# Altium PCB ESP32-S31-CoreBoard-1.PcbDoc (part 1 of 3)
Units mm, origin at the board's own origin, x right, y up, seen from the top; angles counter-clockwise.
Board outline 65 x 55 mm, 6 copper layers (SIG_0, GND_0, SIG_1, GND_1, PWR, SIG2), stack 1.578 mm thick; 144 components, 138 nets, 624 pads, 309 vias.
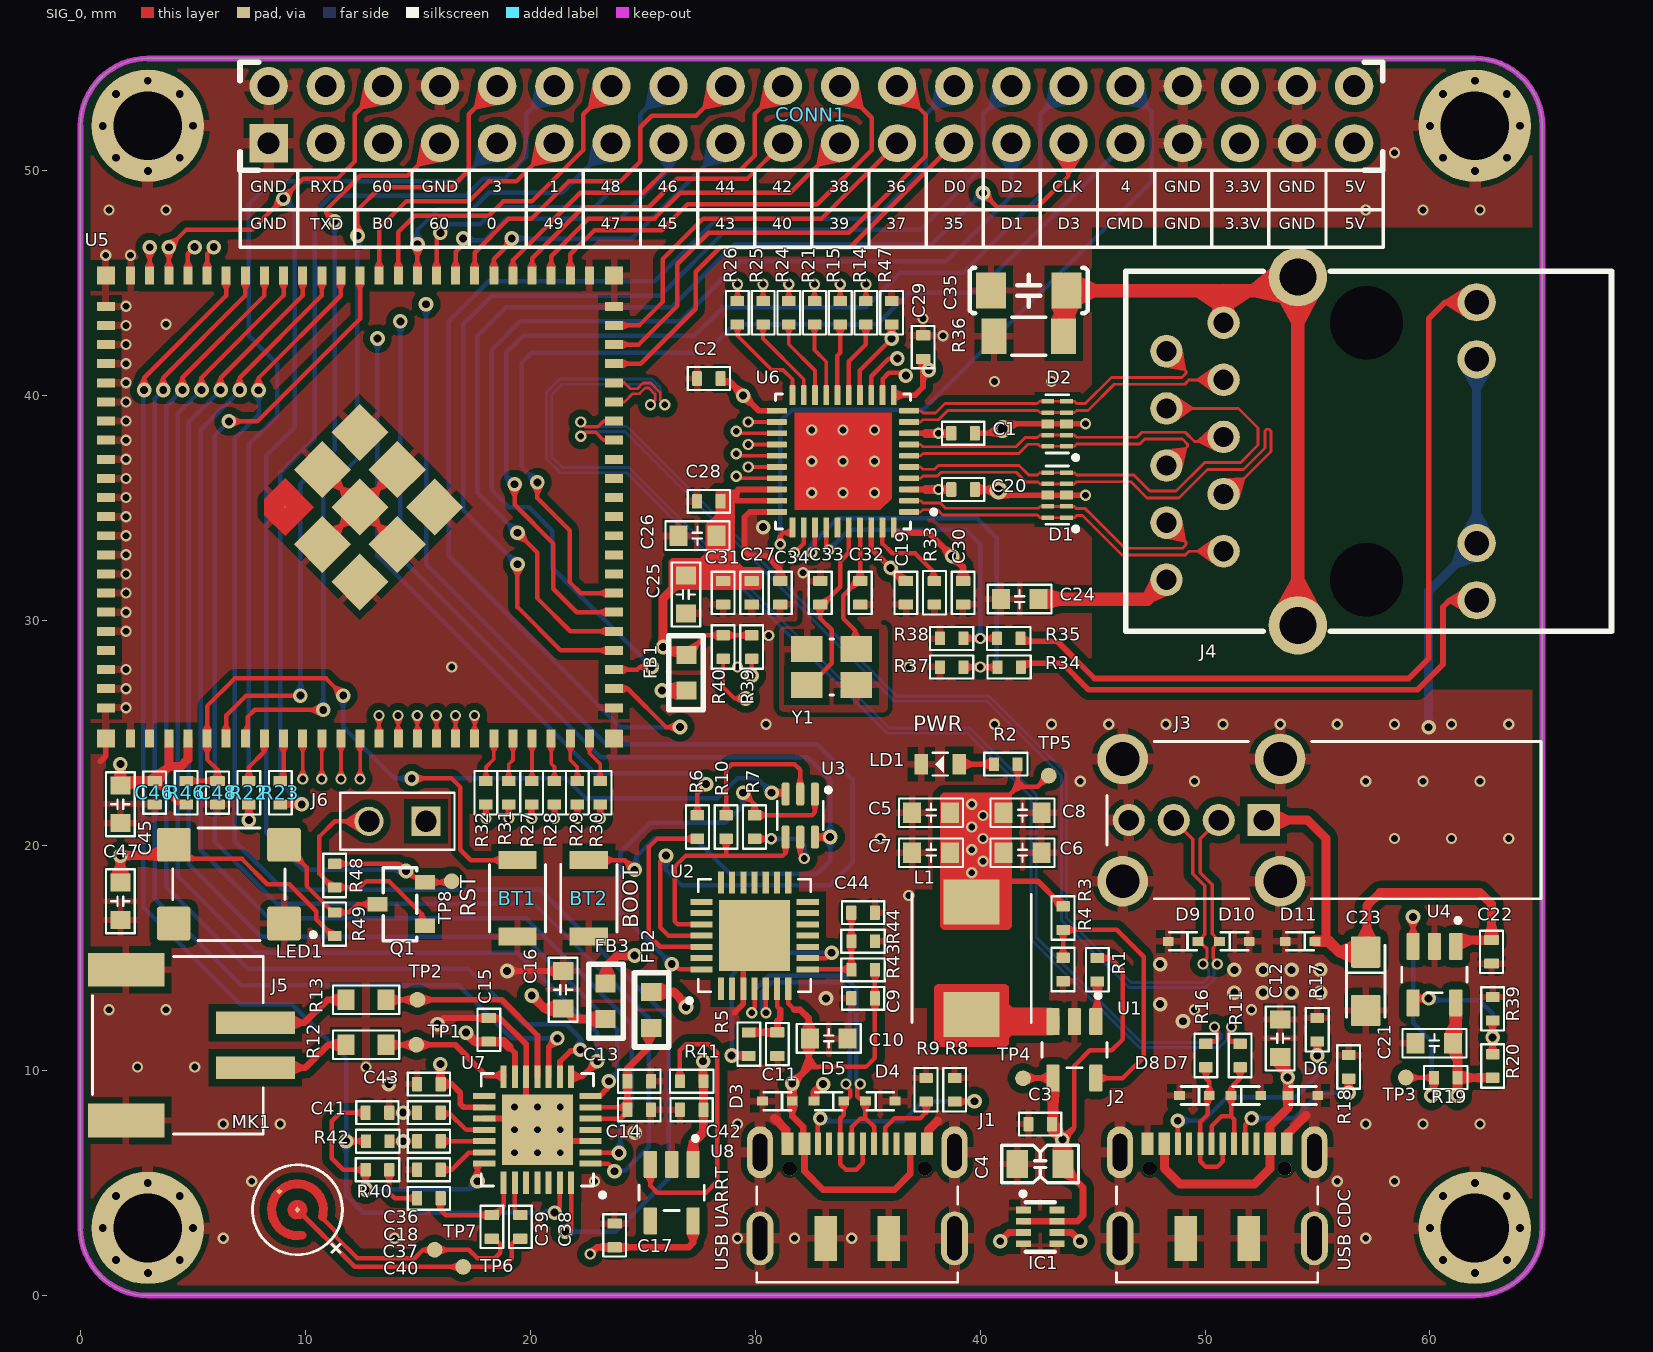
[diagram p0: SIG_0 view]
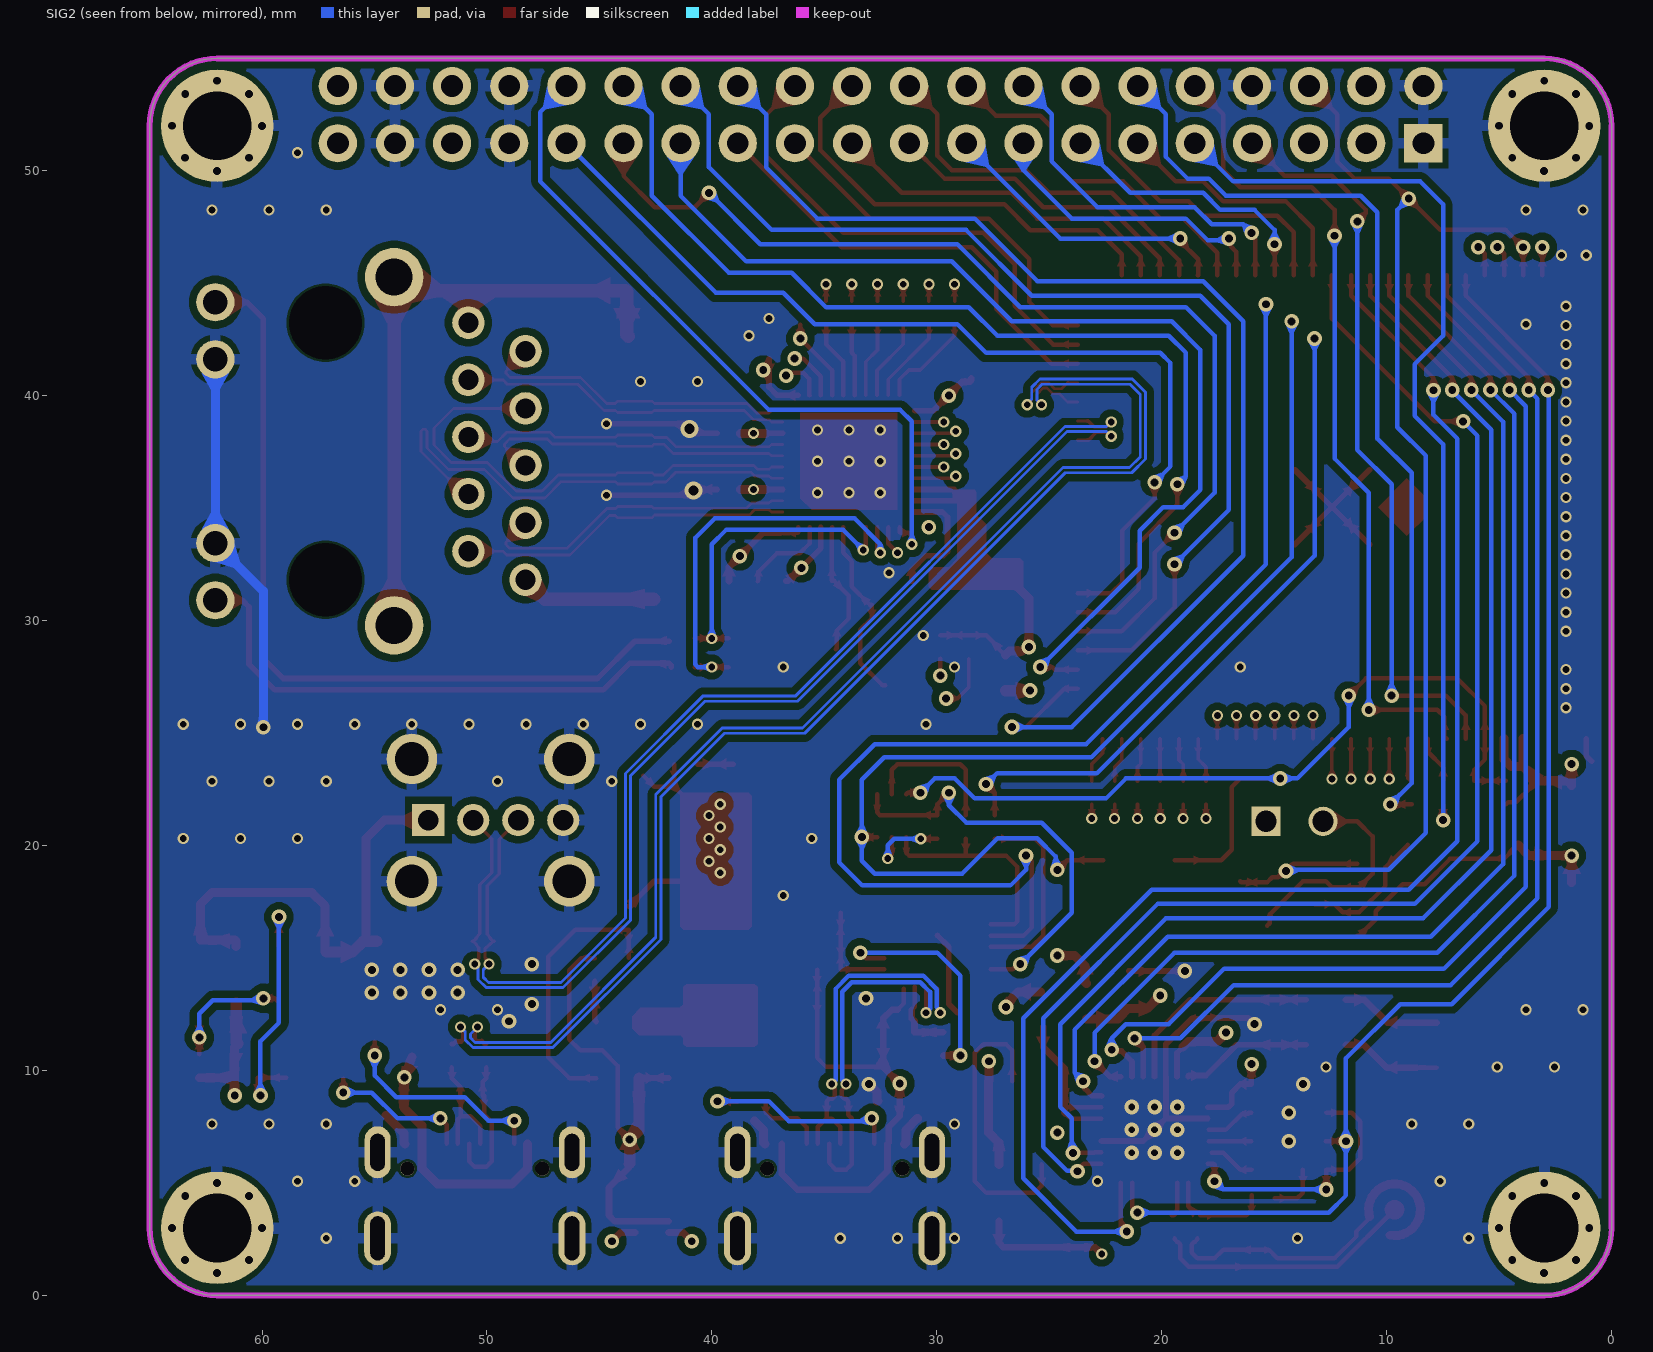
[diagram p1: SIG2 view, seen from below]
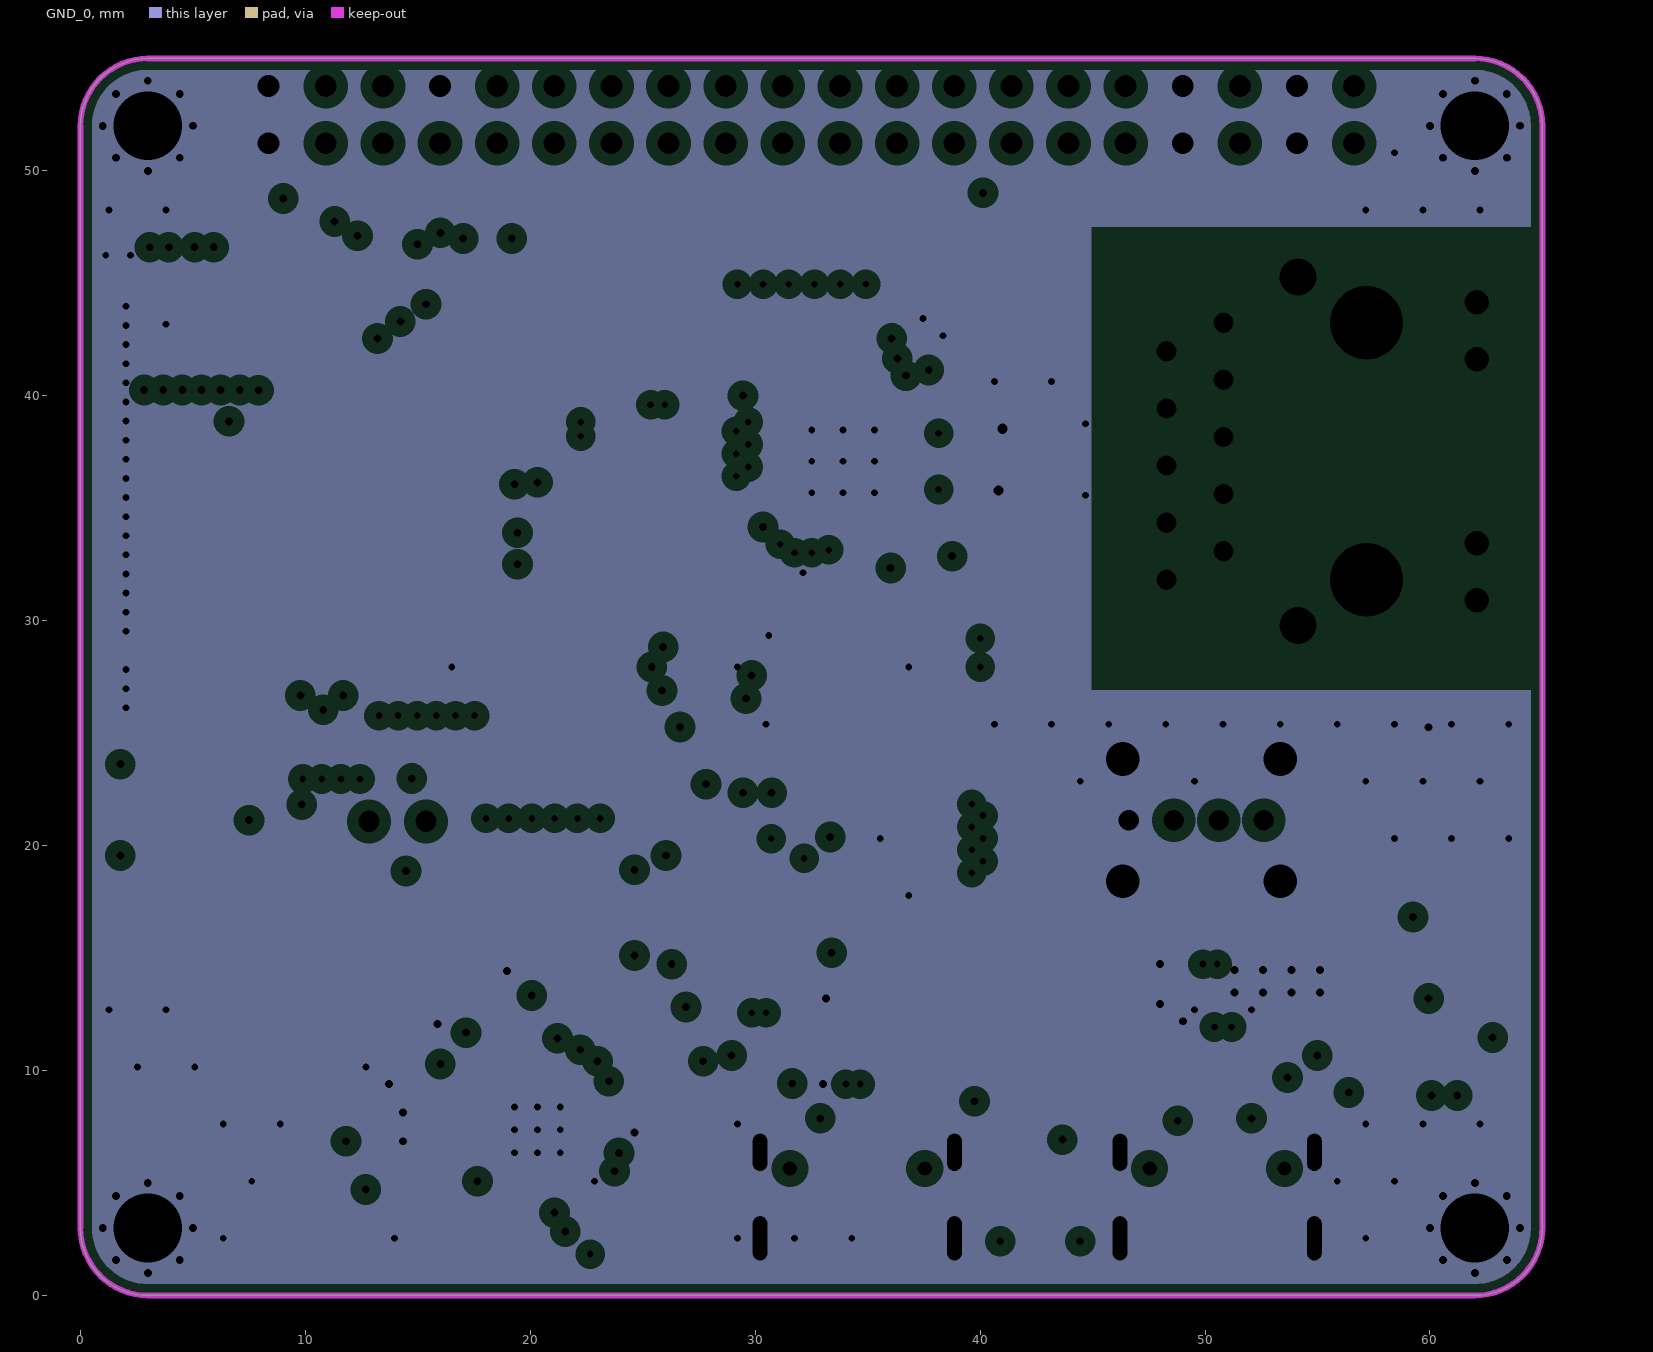
[diagram p2: GND_0, clearances drawn from the general rule]
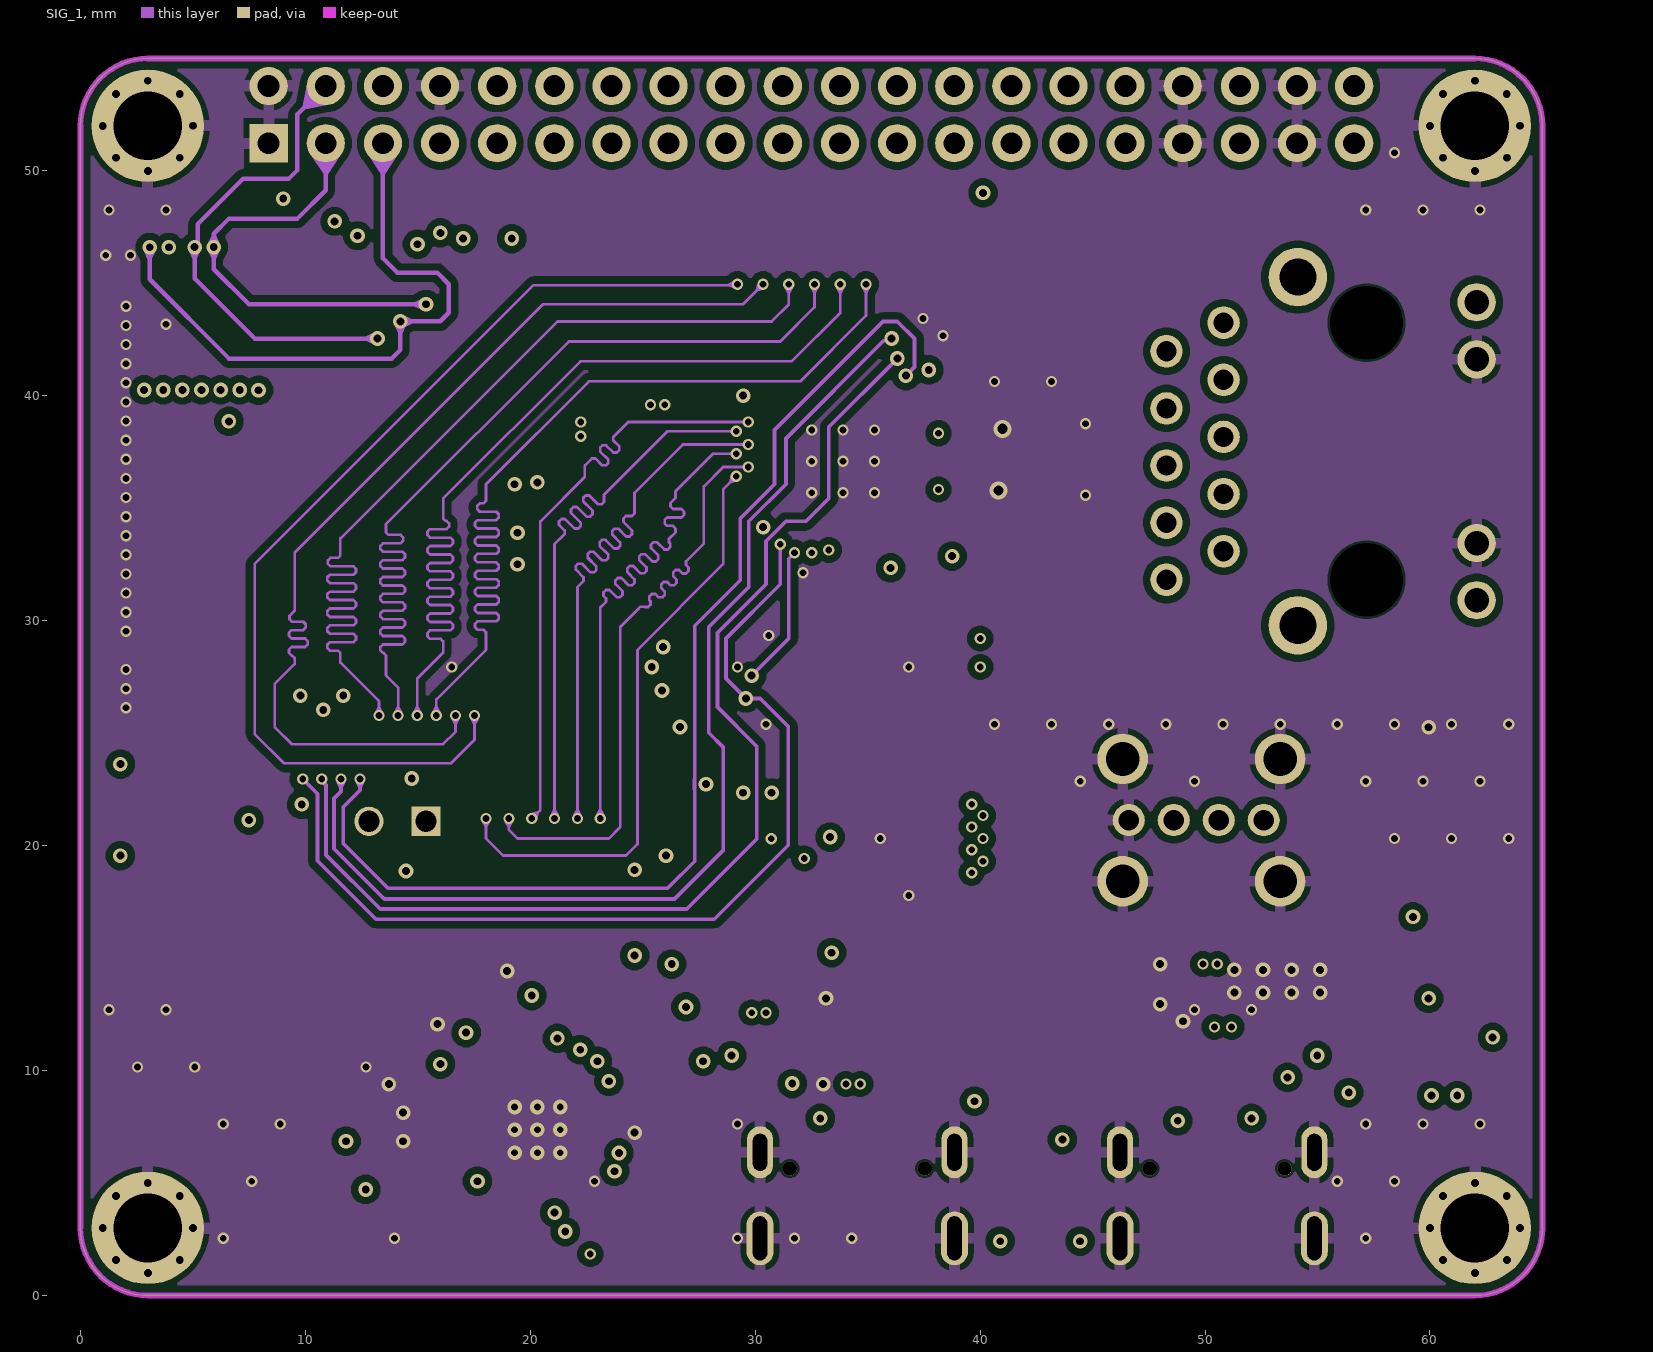
[diagram p3: SIG_1]
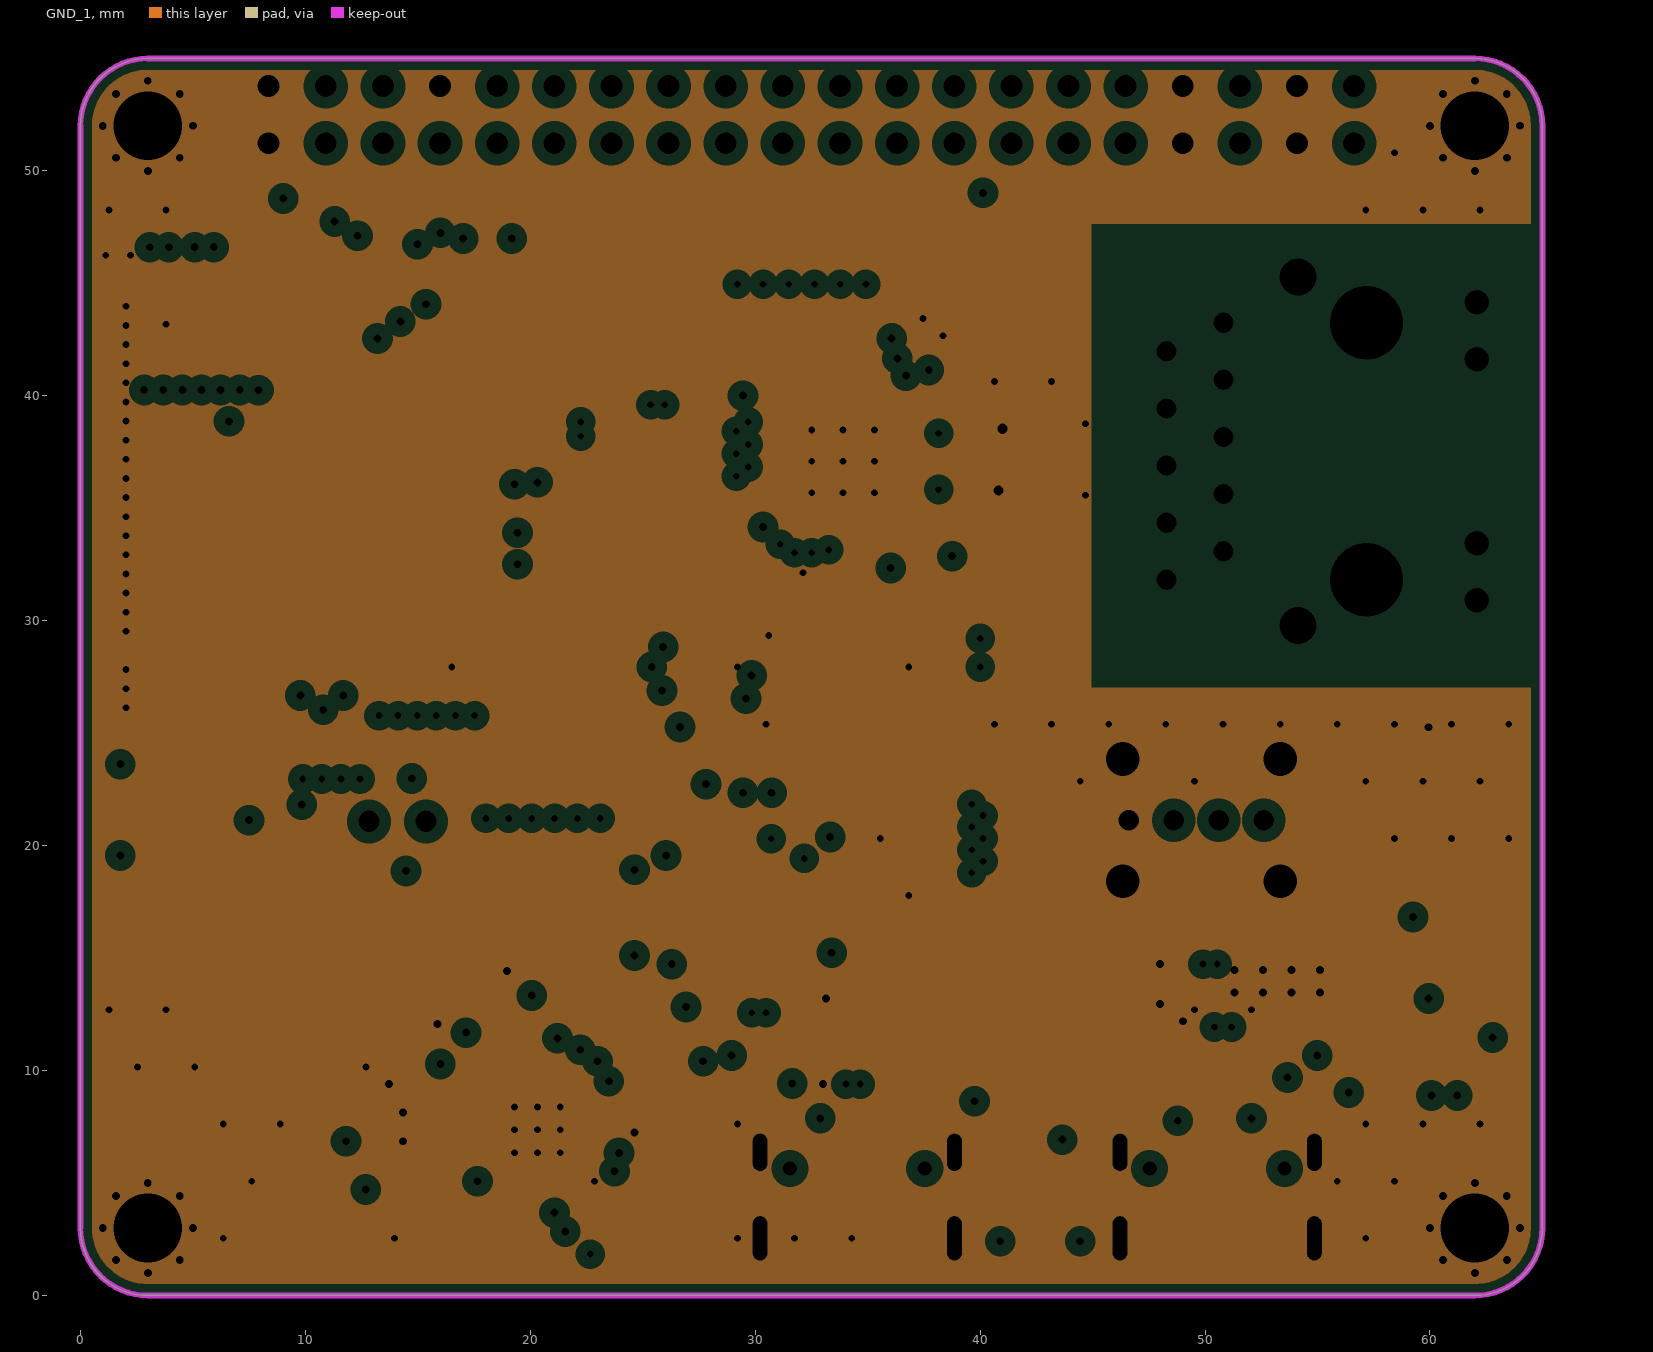
[diagram p4: GND_1, clearances drawn from the general rule]
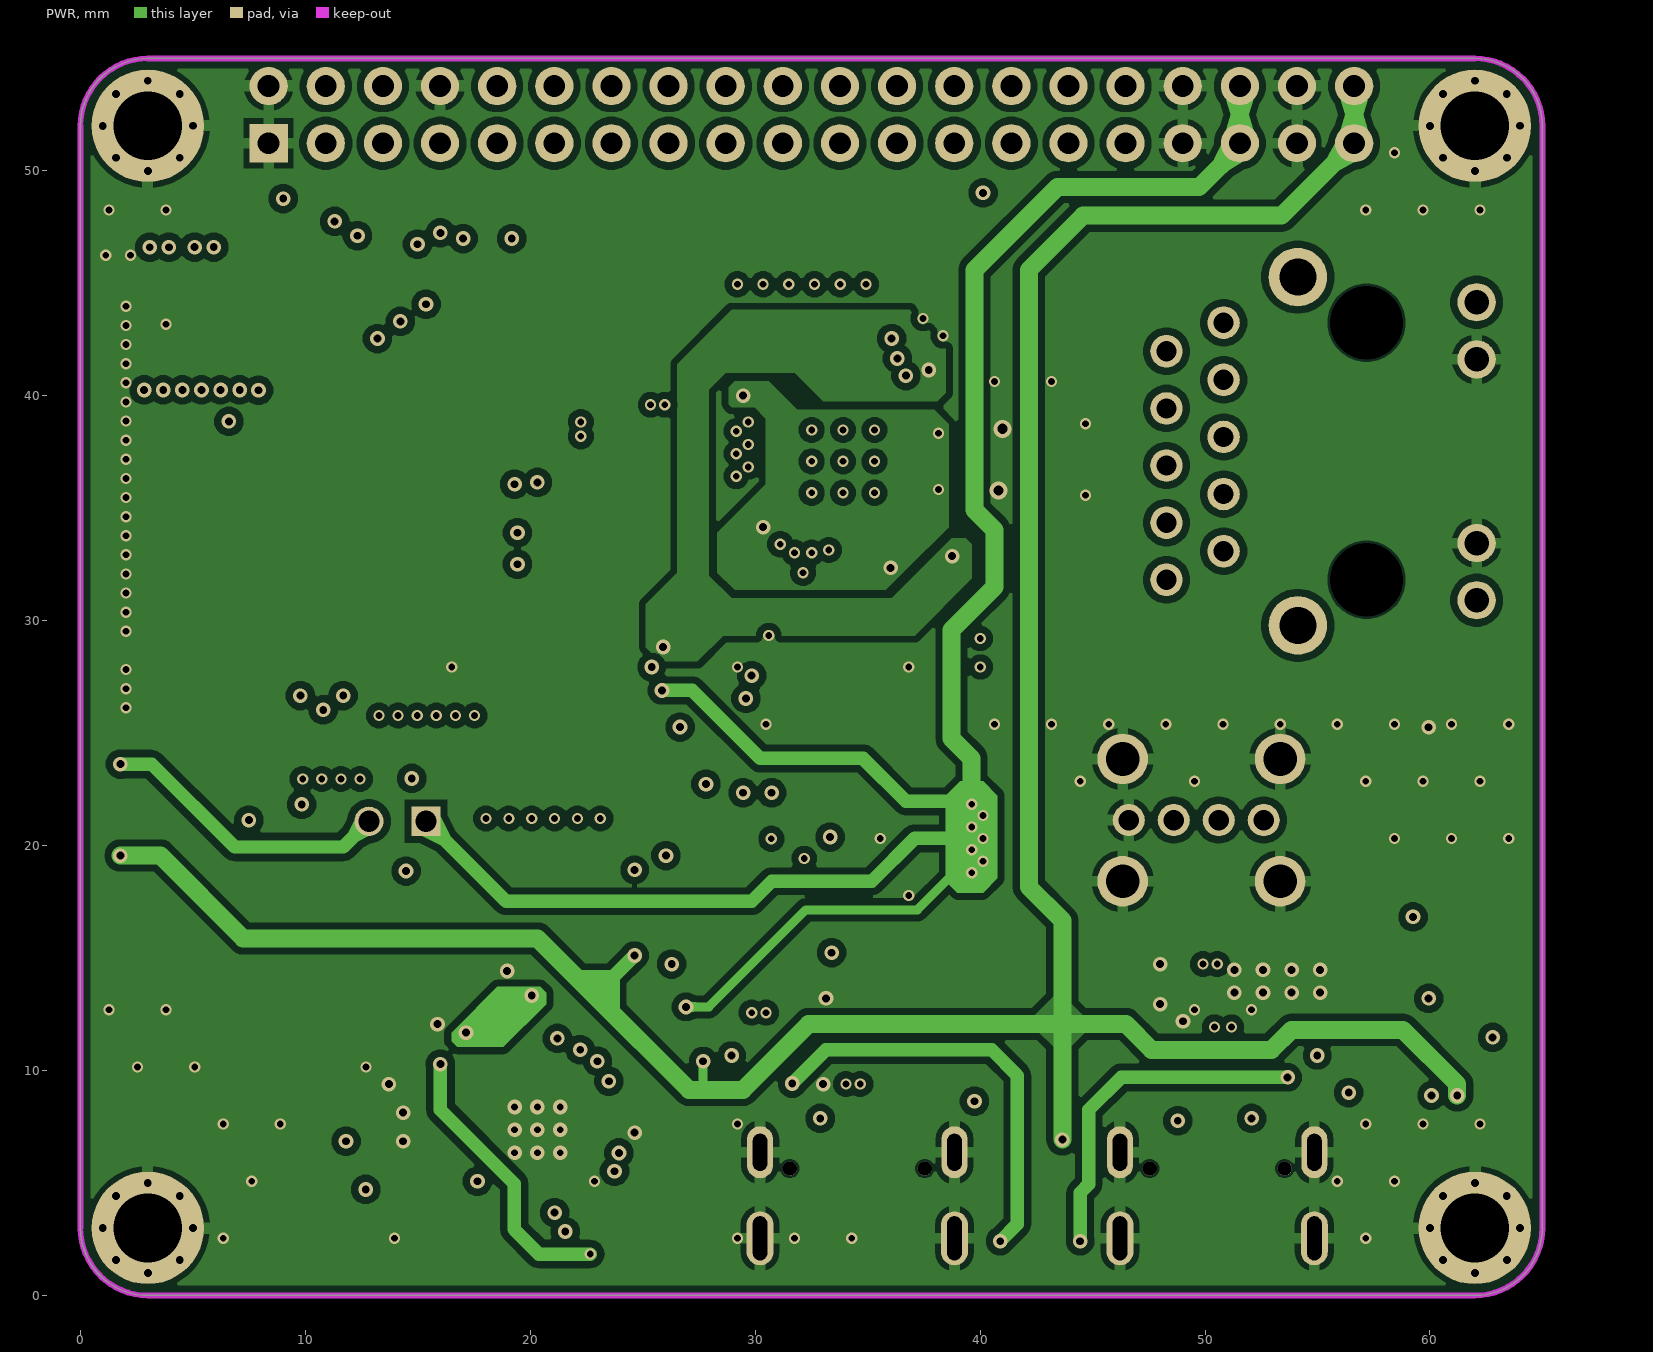
[diagram p5: PWR]

## Layer stack, top to bottom
Top Solder: solder mask 0.0127, Solder Resist, Dk 4.2
SIG_0: signal copper 0.035
Dielectric 2: prepreg 0.0994, PP-006, Dk 4.2
GND_0: plane copper 0.0152, net GND
Dielectric 6: core 0.55, Core, Dk 4.2
SIG_1: signal copper 0.035
Dielectric 1: prepreg 0.1088, PP-014, Dk 4.2
GND_1: plane copper 0.035, net GND
Dielectric 7: core 0.55, Core, Dk 4.2
PWR: signal copper 0.0152
Dielectric 3: prepreg 0.0994, PP-006, Dk 4.2
SIG2: signal copper 0.035
Bottom Solder: solder mask 0.0127, Solder Resist, Dk 4.2

## Board outline
0,3 0,52 cw(c3,52) 3,55 62,55 cw(c62,52) 65,52 65,3 cw(c62,3) 62,0 3,0 cw(c3,3)

## Design rules (kind name [scope] priority, off if disabled: settings)
BoardOutlineClearance pcb [All] p1: gap=0.254 ignorepadtopadclearanceinfootprint=FALSE except(0: Arc-SplitContinuation Track-SplitContinuation SMDPad-SplitContinuation THPad-SplitContinuation Via-SplitContinuation Fill-SplitContinuation Poly-SplitContinuation Region-SplitContinuation Text-SplitContinuation)
Clearance [All] p1: gap=0.32 ignorepadtopadclearanceinfootprint=FALSE except(0: Arc-Text Track-Text SMDPad-Text THPad-Text Via-Text Fill-Text Poly-Text Region-Text Text-Text; 0.102: Arc-Arc Arc-Track Arc-SMDPad Arc-THPad Arc-Via Arc-Hole Track-Track Track-SMDPad Track-THPad Track-Via Track-Hole SMDPad-SMDPad SMDPad-THPad SMDPad-Via SMDPad-Hole THPad-THPad THPad-Via THPad-Hole Via-Via Via-Hole Fill-Hole Poly-Hole Region-Hole Text-Hole)
DiffPairsRouting MDI [InDifferentialPairClass('MDI_class')] p1: maxlimit=0.177 minlimit=0.127 mostfreqgap=0.151 toplayer_mingap=0.177 toplayer_prefgap=0.177 toplayer_minwidth=0.127 toplayer_maxwidth=0.127 toplayer_prefwidth=0.127 impedanceprofiledriven=TRUE impedanceprofileid={8BF83B3B-289C-4500-9CFF-2580BAA26209} impedanceprofilevalue=100.000000 maxuncoupledlength=6
Length MDI_1 [InNetClass('MDI')] p1: maxlimit=0.4 minlimit=0
Length RGMII [InNetClass('RGMII')] p2: maxlimit=0.4 minlimit=0
MaxMinImpedance USB [InNet('No Net')] p1: minimum=10.00 maximum=50.00
PlaneClearance [All] p1: clearance=0.508
PlaneConnect [All] p1: planeconnectstyle=Relief reliefexpansion=0.508 reliefentries=4 reliefconductorwidth=0.254 reliefairgap=0.254
PolygonConnect [All] p1: thpad.connectstyle=Relief thpad.reliefconductorwidth=0.5 thpad.reliefentries=4 thpad.polygonreliefangle="90 Angle" thpad.airgapwidth=0.254 smdpad.connectstyle=Relief smdpad.reliefconductorwidth=0.3 smdpad.reliefentries=4 smdpad.polygonreliefangle="90 Angle" smdpad.airgapwidth=0.3 via.connectstyle=Direct via.reliefconductorwidth=0.254 via.reliefentries=4 via.polygonreliefangle="90 Angle" via.airgapwidth=0.254
RoutingVias [All] p1: holewidth=0.711 width=1.27 viastyle="Through Hole" minholewidth=0.3 minwidth=0.4 maxholewidth=0.711 maxwidth=1.27
SolderMaskExpansion [All] p1: expansion=0.102 istentingtop=FALSE
SupplyNets "Schematic Supply Nets_12" [InNet('ADC_DAC_3V3')] p1: voltage=0.000
SupplyNets "Schematic Supply Nets_2" [InNet('ESP_3V3')] p2: voltage=0.000
SupplyNets "Schematic Supply Nets_11" [InNet('VCC_5V')] p3: voltage=0.000
SupplyNets "Schematic Supply Nets_6" [InNet('VCC_3V3')] p4: voltage=0.000
SupplyNets "Schematic Supply Nets_10" [InNet('PHY_VDDL')] p5: voltage=0.000
SupplyNets "Schematic Supply Nets_9" [InNet('ETH_3V3')] p6: voltage=0.000
SupplyNets "Schematic Supply Nets_8" [InNet('TCT')] p7: voltage=0.000
SupplyNets "Schematic Supply Nets" [InNet('VBUS_HOST')] p8: voltage=0.000
SupplyNets "Schematic Supply Nets_7" [InNet('CHASSIS')] p9: voltage=0.000
SupplyNets "Schematic Supply Nets_5" [InNet('VDD')] p10: voltage=0.000
SupplyNets "Schematic Supply Nets_4" [InNet('VBUS_CDC')] p11: voltage=0.000
SupplyNets "Schematic Supply Nets_3" [InNet('VBUS_UART')] p12: voltage=0.000
SupplyNets "Schematic Supply Nets_1" [InNet('GND')] p13: voltage=0.000
Width RGMII_1 [InNetClass('RGMII')] p1: maxlimit=0.365 minlimit=0.121 preferedwidth=0.165 toplayer_minwidth=0.165 toplayer_maxwidth=0.165 midlayer1_maxwidth=0.121 midlayer1_prefwidth=0.121 impedanceprofiledriven=TRUE impedanceprofileid={7F7283E7-2FD4-493B-95BE-EF3EC65E77F1} impedanceprofilevalue=50.000000 minimp=50.000000 maximp=50.000000 favimp=50.000000
Width [All] p2: maxlimit=3 minlimit=0.12 preferedwidth=0.254
27 further rules are at their usual default settings.

## Classes and differential pairs
differential pair class MDI_class: MDI0 MDI1 MDI2 MDI3
net class RGMII: GPIO8 GPIO9 GPIO10 GPIO11 GPIO12 GPIO13 PHY_AD0 PHY_AD1 PHY_AD2 PLL_OFF RXD_LY TXD_LY
net class MDI: MDI0_N MDI0_P MDI1_N MDI1_P MDI2_N MDI2_P MDI3_N MDI3_P
component class USB: C3 C4 C5 C6 C7 C8 C9 C10 C11 C12 C21 C22 C23 C44 D3 D4 D5 D6 D7 D8 D9 D10 D11 IC1 J1 J2 J3 L1 LD1 R1 R2 R3 R4 R5 R6 R7 R8 R9 R10 R11 R16 R17 R18 R19 R20 R39 R43 R44 TP3 TP4 TP5 U1 U2 U3 U4
component class Ethernet: C1 C2 C19 C20 C24 C25 C26 C27 C28 C29 C30 C31 C32 C33 C34 C35 D1 D2 FB1 J4 R14 R15 R21 R24 R25 R26 R27 R28 R29 R30 R31 R32 R33 R34 R35 R36 R37 R38 R39 R40 R47 U6 Y1
component class ESP32-S31: BT1 BT2 C45 C46 C47 C48 CONN1 J6 LED1 Q1 R22 R23 R46 R48 R49 TP8 U5
component class Audio: C13 C14 C15 C16 C17 C18 C36 C37 C38 C39 C40 C41 C42 C43 FB2 FB3 J5 MK1 R12 R13 R40 R41 R42 TP1 TP2 TP6 TP7 U7 U8
differential pair USB_HOST: +USB_HOST_P -USB_HOST_N
differential pair USB1: +USB1_P -USB1_N
differential pair USB0: +USB0_P -USB0_N
differential pair MDI3: +MDI3_P -MDI3_N
differential pair MDI2: +MDI2_P -MDI2_N
differential pair MDI1: +MDI1_P -MDI1_N
differential pair MDI0: +MDI0_P -MDI0_N

## Components (designator, comment, footprint, x,y, rotation, side; value= is the part's Value field where it differs from the comment)
BT1 "Button-2" SW_B3U-1000PM 19.431,17.653 r90 top
BT2 "Button-2" SW_B3U-1000PM 22.606,17.653 r90 top
C1 "0.1uF 10V 10%" C0402 39.243,38.334 r180 top
C2 "0.1uF 10V 10%" C0402 27.94,40.767 r0 top
C3 "0.1uF 16V 10%" C0402 42.672,7.62 r0 top
C4 "10uF 10V 20%" C0805 42.672,5.842 r0 top
C5 "2.2uF 16V 10%" C0603 37.821,21.463 r180 top
C6 "2.2uF 16V 10%" C0603 41.885,19.685 r0 top
C7 "2.2uF 16V 10%" C0603 37.821,19.685 r180 top
C8 "2.2uF 16V 10%" C0603 41.885,21.463 r0 top
C9 "0.1uF 16V 10%" C0402 34.798,13.208 r0 top
C10 "4.7uF 16V 10%" C0603 33.274,11.43 r180 top
C11 "2.2uF 10V 10%" C0402 30.988,11.176 r90 top
C12 "0.1uF 16V 10%" C0603 53.34,11.43 r270 top
C13 "1uF 10V 10%" C0402 24.846,9.525 r0 top
C14 "1uF 10V 10%" C0402 24.846,8.255 r0 top
C15 "100pF 16V 10%" C0402 18.161,11.811 r90 top
C16 "10uF 16V 10%" C0603 21.463,13.589 r90 top
C17 "1uF 16V 10%" C0402 23.749,2.667 r90 top
C18 "1uF 10V 10%" C0402 15.494,6.858 r180 top
C19 "0.1uF 10V 10%" C0402 36.703,31.242 r90 top
C20 "0.1uF 10V 10%" C0402 39.243,35.834 r180 top
C21 "10uF 10V 20%" C0603 60.198,11.214 r0 top
C22 "0.1uF/16V 10%" C0402 62.738,15.278 r90 top
C23 "22uF 10V 20%" C1206P 57.15,13.97 r270 top
C24 "1uF 16V 10%" C0603 41.758,30.963 r180 top
C25 "4.7uF 6.3V 10%" C0603 26.924,31.166 r90 top
C26 "4.7uF 6.3V 10%" C0603 27.432,33.782 r0 top
C27 "0.1uF 10V 10%" C0402 29.845,31.242 r90 top
C28 "0.1uF 10V 10%" C0402 27.94,35.306 r0 top
C29 "0.1uF 10V 10%" C0402 37.465,42.164 r270 top
C30 "0.1uF 10V 10%" C0402 39.243,31.242 r90 top
C31 "0.1uF 10V 10%" C0402 28.575,31.242 r90 top
C32 "8.2pF/50V 10%" C0402 34.671,31.242 r90 top
C33 "8.2pF/50V 10%" C0402 32.893,31.242 r270 top
C34 "0.1uF 10V 10%" C0402 31.115,31.242 r90 top
C35 "1000pF/2KV" C1206 42.164,44.679 r0 top
C36 "1uF 10V 10%" C0402 15.494,8.128 r180 top
C37 "1uF 10V 10%" C0402 15.494,5.588 r180 top
C38 "1uF 16V 10%" C0402 19.562,3.048 r90 top
C39 "1uF 16V 10%" C0402 18.292,3.048 r90 top
C40 "1uF 16V 10%" C0402 15.494,4.318 r180 top
C41 "1uF 16V 10%" C0402 13.208,8.128 r0 top
C42 "1uF 16V 10%" C0402 27.178,8.255 r180 top
C43 "1uF 16V 10%" C0402 15.494,9.398 r180 top
C44 "2.2uF 10V 10%" C0402 34.798,17.018 r180 top
C45 "4.7uF 6.3V 10%" C0603 1.778,21.844 r90 top
C46 "0.1uF 10V 10%" C0402 3.302,22.352 r90 top
C47 "1uF 16V 10%" C0603 1.778,17.526 r90 top
C48 "1uF 16V 10%" C0402 6.096,22.352 r270 top
CONN1 "CONNECTOR-2X20" "2.54 2X20" 7.1,51.228 r0 top
D1 "TPD4E02B04DQAR" USON-10 43.426,35.579 r180 top
D2 "TPD4E02B04DQAR" USON-10 43.426,38.754 r180 top
D3 "LESD5D5.0CT1G" SOD-523 30.988,8.636 r180 top
D4 "LESD5D5.0CT1G" SOD-523 35.56,8.636 r0 top
D5 "LESD5D5.0CT1G" SOD-523 33.274,8.636 r180 top
D6 "LESD5D5.0CT1G" SOD-523 54.356,8.89 r0 top
D7 "LESD5D5.0CT1G" SOD-523 51.816,8.89 r0 top
D8 "LESD5D5.0CT1G" SOD-523 49.53,8.89 r180 top
D9 "LESD5D5.0CT1G" SOD-523 49.022,15.748 r180 top
D10 "LESD5D5.0CT1G" SOD-523 51.308,15.748 r0 top
D11 "LESD5D5.0CT1G" SOD-523 54.229,15.748 r180 top
FB1 "33R 100MHz" L0603 26.924,27.686 r90 top
FB2 "120R 100MHz" L0603 25.4,12.7 r270 top
FB3 "330R 100MHz" L0603 23.368,13.081 r270 top
IC1 "LM66200DRLR" SOT8 42.672,3.048 r270 top
J1 "USB-C" JAE_DX07S016JA1R1500 34.54,5.64 r0 top
J2 "USB-C" JAE_DX07S016JA1R1500 50.54,5.64 r0 top
J3 "USB-A1SSW6" USB-A-VERTICAL 52.61,21.135 r90 top
J4 "HR911130C" HR911130C 57.277,37.084 r270 top
J5 "SPK 4R-8R" JST_S2B-PH-SM4-TB(LF)(SN) 7.782,11.128 r270 top
J6 "Jump_2.54mm" "2.54 2X1" 15.367,21.082 r180 top
L1 "2.2uH 20%" IND_ASPI-0530HI-2R2M-T2 39.624,14.986 r90 top
LD1 "LED-SMD" LED0603 38.227,23.622 r180 top
LED1 "ARGB" WS2812-5050 6.604,18.288 r0 top
MK1 "MIC-0413" MIC_CMEJ-0413-42-SMT-TR 9.652,3.81 r135 top
Q1 "Mosfet N Signal" SOT-23 14.224,17.399 r90 top
R1 "10K 1%" R0402 45.212,14.478 r90 top
R2 "6.8K 1%" R0402 41.148,23.622 r180 top
R3 "100K 1%" R0402 43.688,16.779 r90 top
R4 "22.1K 1%" R0402 43.688,14.493 r90 top
R5 "1K 1%" R0402 29.718,11.176 r270 top
R6 "499R 1%" R0402 27.436,20.828 r270 top
R7 "10K 1%" R0402 29.972,20.828 r270 top
R8 "5.1K 1%" R0402 38.866,9.144 r90 top
R9 "5.1K 1%" R0402 37.596,9.144 r90 top
R10 "10K 1%" R0402 28.706,20.828 r90 top
R11 "33R" R0402 51.562,10.668 r90 top
R12 "0R 1%" R0603 12.7,11.144 r180 top
R13 "0R 1%" R0603 12.7,13.144 r180 top
R14 "33R 1%" R0402 34.925,43.688 r270 top
R15 "33R 1%" R0402 33.782,43.688 r270 top
R16 "33R" R0402 50.038,10.668 r90 top
R17 "5.1K 1%" R0402 54.991,11.811 r90 top
R18 "5.1K 1%" R0402 56.388,10.16 r90 top
R19 "10K 1%" R0402 60.706,9.69 r0 top
R20 "10K 1%" R0402 62.789,10.203 r270 top
R21 "33R 1%" R0402 32.639,43.688 r270 top
R22 "0R" R0402 7.493,22.352 r90 top
R23 "0R" R0402 8.89,22.352 r90 top
R24 "33R 1%" R0402 31.496,43.688 r270 top
R25 "33R 1%" R0402 30.353,43.688 r270 top
R26 "33R 1%" R0402 29.21,43.688 r270 top
R27 "33R 1%" R0402 20.062,22.352 r270 top
R28 "33R 1%" R0402 21.078,22.352 r270 top
R29 "33R 1%" R0402 22.094,22.352 r270 top
R30 "33R 1%" R0402 23.11,22.352 r270 top
R31 "33R 1%" R0402 19.046,22.352 r270 top
R32 "33R 1%" R0402 18.03,22.352 r270 top
R33 "2.49K 1%" R0402 37.973,31.242 r90 top
R34 "330R 1%" R0402 41.29,27.94 r0 top
R35 "330R 1%" R0402 41.275,29.21 r0 top
R36 "1M 5%" R1206 42.164,42.647 r180 top
R37 "4.7K 1%" R0402 38.735,27.94 r180 top
R38 "4.7K 1%" R0402 38.735,29.21 r180 top
R39 "4.7K 1%" R0402 29.845,28.829 r270 top
R39 "10K 1%" R0402 62.789,12.743 r270 top
R40 "4.7K 1%" R0402 28.575,28.829 r270 top
R40 "2.2K 1%" R0402 13.208,5.588 r0 top
R41 "10K 1%" R0402 27.178,9.525 r0 top
R42 "10K 1%" R0402 13.223,6.858 r180 top
R43 "22.1K 1%" R0402 34.798,14.478 r0 top
R44 "47.5K 1%" R0402 34.798,15.748 r0 top
R46 "10K 1%" R0402 4.699,22.352 r90 top
R47 "4.7K 1%" R0402 36.068,43.688 r270 top
R48 "10K 1%" R0402 11.303,18.669 r90 top
R49 "10K 1%" R0402 11.303,16.51 r90 top
TP1 "Test point" TP 14.939,11.144 r180 top
TP2 "Test point" TP 14.986,13.144 r180 top
TP3 "Test point" TP 58.928,9.69 r180 top
TP4 "Test point" TP 41.91,9.652 r90 top
TP5 "Test point" TP 43.053,23.114 r90 top
TP6 "Test point" TP 17.018,1.27 r90 top
TP7 "Test point" TP 15.748,2.032 r90 top
TP8 "Test point" TP 16.51,18.415 r135 top
U1 "TLV62569PDDCR" SOT23-5 44.196,10.922 r270 top
U2 "CP2102N-A02-GQFN28" QFN-28 29.972,16.002 r90 top
U3 "BC847" SOT-363 32.004,21.336 r270 top
U4 "TPS2051CDBVR" SOT23-5 60.198,14.262 r270 top
U5 "ESP32-S31-WROOM-3" ESP32-S31-WROOM-3 24.433,24.052 r90 top
U6 "YT8531" QFN-40 33.909,37.084 r180 top
U7 "ES8374" QFN-28 20.32,7.366 r180 top
U8 "ME6211C33M5G" SOT23-5 26.289,4.572 r270 top
Y1 "X322525MRB4SI" "XTAL 4P 3225" 33.401,27.94 r90 top

## Footprints (in the part's own frame and the unit in brackets; to place one, negate y for a bottom-side part, rotate by r counter-clockwise, add the part's x,y. Pads: shape width x height; smd on the part's side, far side on the other; paste and mask are expansions set on the pad)
"2.54 2X1" [mm]
  rect 1.3x1.3 hole 0.94: 1(0,0)
  round 1.3 hole 0.94: 2(2.54,0)
  silkscreen extent -1.27,-1.27 3.81,1.27, body extent -1.33,-1.23 3.87,1.27, height 8.5
"2.54 2X20" [mm]
  rect 1.7x1.7 hole 0.97: 1(1.27,0)
  round 1.7 hole 0.97: 2(1.27,2.54) 3(3.81,0) 4(3.81,2.54) 5(6.35,0) 6(6.35,2.54) 7(8.89,0) 8(8.89,2.54) 9(11.43,0) 10(11.43,2.54) 11(13.97,0) 12(13.97,2.54) 13(16.51,0) 14(16.51,2.54) 15(19.05,0) 16(19.05,2.54) 17(21.59,0) 18(21.59,2.54) 19(24.13,0) 20(24.13,2.54) 21(26.67,0) 22(26.67,2.54) 23(29.21,0) 24(29.21,2.54) 25(31.75,0) 26(31.75,2.54) 27(34.29,0) 28(34.29,2.54) 29(36.83,0) 30(36.83,2.54) 31(39.37,0) 32(39.37,2.54) 33(41.91,0) 34(41.91,2.54) 35(44.45,0) 36(44.45,2.54) 37(46.99,0) 38(46.99,2.54) 39(49.53,0) 40(49.53,2.54)
  silkscreen extent 0,-1.2 50.8,3.6, body extent 0,-1.2 50.8,3.6, height 8.56
C0402 [mm]
  rrect20% 0.45x0.65 smd: 1(-0.525,0) 2(0.525,0)
  silkscreen extent -0.94,-0.51 0.94,0.51, body extent -0.5,-0.25 0.5,0.25, height 0.5
C0603 [mm]
  rect 0.8x0.9 smd: 1(-0.838,0) 2(0.838,0)
  silkscreen extent -1.42,-0.64 1.42,0.64, body extent -0.8,-0.4 0.8,0.41, height 0.86
C0805 [mm]
  rect 0.95x1.26 smd: 1(-1.016,0) 2(1.016,0)
  silkscreen extent -1.7,-0.84 1.7,0.84, body extent -1.01,-0.62 1,0.62, height 0.94
C1206 [mm]
  rect 1.35x1.6 smd: 1(-1.676,0) 2(1.676,0)
  silkscreen extent -2.62,-1.02 2.62,1.02, body extent -1.6,-0.8 1.6,0.8, height 0.94
C1206P [mm]
  rrect10% 1.4x1.32 smd paste+0 mask+0.102: 1(-1.3,0) 2(1.3,0)
  silkscreen extent -1.6,-0.85 1.6,0.85, body extent -1.6,-0.8 1.6,0.8, height 1.8
ESP32-S31-WROOM-3 [mm]
  rect 0.8x0.4 smd: 1(0.7,22.2) 2(0.7,21.35) 3(0.7,20.5) 4(0.7,19.65) 5(0.7,18.8) 6(0.7,17.95) 7(0.7,17.1) 8(0.7,16.25) 9(0.7,15.4) 10(0.7,14.55) 11(0.7,13.7) 12(0.7,12.85) 13(0.7,12) 14(0.7,11.15) 15(0.7,10.3) 16(0.7,9.45) 17(0.7,8.6) 18(0.7,7.75) 19(0.7,6.9) 20(0.7,6.05) 21(0.7,5.2) 22(0.7,4.35) 23(0.7,3.5) 24(0.7,2.65) 25(0.7,1.8) 48(21.3,1.8) 49(21.3,2.65) 50(21.3,3.5) 51(21.3,4.35) 52(21.3,5.2) 53(21.3,6.05) 54(21.3,6.9) 55(21.3,7.75) 56(21.3,8.6) 57(21.3,9.45) 58(21.3,10.3) 59(21.3,11.15) 60(21.3,12) 61(21.3,12.85) 62(21.3,13.7) 63(21.3,14.55) 64(21.3,15.4) 65(21.3,16.25) 66(21.3,17.1) 67(21.3,17.95) 68(21.3,18.8) 69(21.3,19.65) 70(21.3,20.5) 71(21.3,21.35) 72(21.3,22.2)
  rect 0.4x0.8 smd: 26(2.075,0.7) 27(2.925,0.7) 28(3.775,0.7) 29(4.625,0.7) 30(5.475,0.7) 31(6.325,0.7) 32(7.175,0.7) 33(8.025,0.7) 34(8.875,0.7) 35(9.725,0.7) 36(10.575,0.7) 37(11.425,0.7) 38(12.275,0.7) 39(13.125,0.7) 40(13.975,0.7) 41(14.825,0.7) 42(15.675,0.7) 43(16.525,0.7) 44(17.375,0.7) 45(18.225,0.7) 46(19.075,0.7) 47(19.925,0.7) 73(19.925,23.3) 74(19.075,23.3) 75(18.225,23.3) 76(17.375,23.3) 77(16.525,23.3) 78(15.675,23.3) 79(14.825,23.3) 80(13.975,23.3) 81(13.125,23.3) 82(12.275,23.3) 83(11.425,23.3) 84(10.575,23.3) 85(9.725,23.3) 86(8.875,23.3) 87(8.025,23.3) 88(7.175,23.3) 89(6.325,23.3) 90(5.475,23.3) 91(4.625,23.3) 92(3.775,23.3) 93(2.925,23.3) 94(2.075,23.3)
  rect 1.8x1.8 smd rot 135: 95(7.677,12.008) 95(9.338,13.67) 95(9.338,10.346) 95(11,12.008) 95(11,8.685) 95(12.662,10.346)
  round 0.025 smd paste-2539.97 mask-2539.97: 95(11,15.331)
  rect 1.8x1.8 smd rot 45: 95(12.662,13.67) 95(14.323,12.008)
  rect 0.8x0.8 smd: 96(0.7,0.7) 97(21.3,0.7) 98(21.3,23.3) 99(0.7,23.3)
  SIG_0 region: 9.727,15.331 10.646,16.251 11.354,16.251 12.273,15.331 11,14.059
  body extent 0,0 22,30, height 3.02
HR911130C [mm]
  round 1.446 hole 0.9: 1(5.265,-8.99) 2(3.995,-6.45) 3(2.725,-8.99) 4(1.455,-6.45) 5(0.185,-8.99) 6(-1.085,-6.45) 7(-2.355,-8.99) 8(-3.625,-6.45) 9(-4.895,-8.99) 10(-6.165,-6.45)
  round 1.7 hole 1.1: 11(6.175,4.8) 12(3.635,4.8) 13(-4.535,4.8) 14(-7.075,4.8)
  round 2.6 hole 1.65: 15(-8.195,-3.15) 16(7.295,-3.15)
  round 1.625 hole 3.25 unplated: 17(-6.165,-0.1) 18(5.265,-0.1)
  silkscreen extent -8.45,-10.8 7.55,10.8, body extent -9.45,-10.9 8.53,10.7, height 15.01
IND_ASPI-0530HI-2R2M-T2 [mm]
  rect 2x2.5 smd: 1(-2.5,0) 2(2.5,0)
  silkscreen extent -2.85,-2.65 2.85,2.65, body extent -2.8,-2.6 2.8,2.6, height 3
JAE_DX07S016JA1R1500 [mm]
  rect 0.52x1 smd: 1(-3.1,1.1) 2(-2.35,1.1) 11(2.35,1.1) 12(3.1,1.1)
  rect 0.27x1 smd: 3(-1.75,1.1) 4(-1.25,1.1) 5(-0.75,1.1) 6(-0.25,1.1) 7(0.25,1.1) 8(0.75,1.1) 9(1.25,1.1) 10(1.75,1.1)
  rect 1x2 smd: S1(-1.4,-3.1) S2(1.4,-3.1)
  oval 1.158x2.316 hole 0.65 slot 1.65 at 90 deg: S3(-4.32,0.725) S4(4.32,0.725)
  oval 1.2x2.4 hole 0.65 slot 1.95 at 90 deg: S5(-4.32,-3.1) S6(4.32,-3.1)
  round 0.63 hole 0.63 unplated: ""(-3,0) ""(3,0)
  round 0.6 hole 0.6 unplated: ""(3,0)
  silkscreen extent -4.47,-5.05 4.47,-0.8, body extent -4.47,-5.61 4.47,1.29, height 3.31
JST_S2B-PH-SM4-TB(LF)(SN) [mm]
  rect 1x3.5 smd: 1(-1,0) 2(1,0)
  rect 1.5x3.4 smd: ""(-3.35,-5.75) ""(3.35,-5.75)
  silkscreen extent -3.95,-7.25 3.95,0.35, body extent -3.95,-7.24 3.95,1.36, height 5.5
L0603 [mm]
  rect 0.8x0.9 smd: 1(-0.8,-0.019) 2(0.8,-0.019)
  silkscreen extent -1.65,-0.76 1.65,0.76, body extent -0.8,-0.42 0.8,0.38, height 0.8
LED0603 [mm]
  rect 0.6x0.9 smd: 1(-0.838,0) 2(0.838,0)
  silkscreen extent -0.33,-0.51 0.33,0.51, body extent -0.81,-0.4 0.81,0.4, height 0.6
MIC_CMEJ-0413-42-SMT-TR [mm]
  rect 0.2x0.2 smd paste-1 mask+0: 1(0,0) 2(1.15,0)
  SIG_0 region: 0.023,0.429 0.045,0.428 0.067,0.425 0.089,0.421 0.111,0.415 0.133,0.409 0.154,0.401 0.175,0.393 0.195,0.383 0.215,0.372 0.234,0.361 0.253,0.348 0.271,0.334 0.288,0.32 0.304,0.304 0.32,0.288 0.334,0.271 0.348,0.253 0.361,0.234 0.372,0.215 0.383,0.195 0.393,0.175 0.401,0.154 0.409,0.133 0.415,0.111 0.421,0.089 0.425,0.067 0.428,0.045 0.429,0.023 0.43,0 0.429,-0.023 0.428,-0.045 0.425,-0.067 0.421,-0.089 0.415,-0.111 0.409,-0.133 0.401,-0.154 0.393,-0.175 0.383,-0.195 0.372,-0.215 0.361,-0.234 0.348,-0.253 0.334,-0.271 0.32,-0.288 0.304,-0.304 0.288,-0.32 0.271,-0.334 0.253,-0.348 0.234,-0.361 0.215,-0.372 0.195,-0.383 0.175,-0.393 0.154,-0.401 0.133,-0.409 0.111,-0.415 0.089,-0.421 0.067,-0.425 0.045,-0.428 0.023,-0.429 0,-0.43 -0.019,-0.43 -0.038,-0.428 -0.057,-0.426 -0.077,-0.423 -0.095,-0.419 -0.114,-0.415 -0.133,-0.409 -0.151,-0.403 -0.169,-0.396 -0.186,-0.388 -0.203,-0.379 -0.22,-0.369 -0.236,-0.359 -0.252,-0.348 -0.268,-0.336 -0.282,-0.324 -0.297,-0.311 -0.31,-0.298 -0.323,-0.283 -0.336,-0.269 -0.347,-0.253 -0.358,-0.237 -0.369,-0.221 -0.378,-0.204 -0.387,-0.187 -0.395,-0.17 -0.402,-0.152 -0.409,-0.134 -0.414,-0.115 -0.418,-0.1 -1.7,-0.1 -1.7,0.1 -0.418,0.1 -0.414,0.115 -0.409,0.134 -0.402,0.152 -0.395,0.17 -0.387,0.187 -0.378,0.204 -0.369,0.221 -0.358,0.237 -0.347,0.253 -0.336,0.269 -0.323,0.283 -0.31,0.298 -0.297,0.311 -0.282,0.324 -0.268,0.336 -0.252,0.348 -0.236,0.359 -0.22,0.369 -0.203,0.379 -0.186,0.388 -0.169,0.396 -0.151,0.403 -0.133,0.409 -0.114,0.415 -0.095,0.419 -0.077,0.423 -0.057,0.426 -0.038,0.428 -0.019,0.43 0,0.43
  SIG_0 lines w0.4: -0.942,0.66 cw(c0,0) -0.899,-0.718 cw(c0,0) -0.996,-0.575
  silkscreen extent -2.67,-2 2,2, body extent -2,-2 2,2, height 1.4
QFN-28 [mm]
  rect 0.99x0.27 smd paste+0 mask+0.102: 1(-2.36,1.5) 2(-2.36,1) 3(-2.36,0.5) 4(-2.36,0) 5(-2.36,-0.5) 6(-2.36,-1) 7(-2.36,-1.5) 15(2.36,-1.5) 16(2.36,-1) 17(2.36,-0.5) 18(2.36,0) 19(2.36,0.5) 20(2.36,1) 21(2.36,1.5)
  rect 0.27x0.99 smd paste+0 mask+0.102: 8(-1.5,-2.36) 9(-1,-2.36) 10(-0.5,-2.36) 11(0,-2.36) 12(0.5,-2.36) 13(1,-2.36) 14(1.5,-2.36) 22(1.5,2.36) 23(1,2.36) 24(0.5,2.36) 25(0,2.36) 26(-0.5,2.36) 27(-1,2.36) 28(-1.5,2.36)
  rect 3.15x3.15 smd paste-0.597 mask+0.102: 29(0,0)
  silkscreen extent -3,-2.5 2.5,3, body extent -2.5,-2.5 2.5,2.5, height 0.8
QFN-40 [mm]
  rrect25% 0.89x0.26 smd: 1(-2.94,2.25) 2(-2.94,1.75) 3(-2.94,1.25) 4(-2.94,0.75) 5(-2.94,0.25) 6(-2.94,-0.25) 7(-2.94,-0.75) 8(-2.94,-1.25) 9(-2.94,-1.75) 10(-2.94,-2.25) 21(2.94,-2.25) 22(2.94,-1.75) 23(2.94,-1.25) 24(2.94,-0.75) 25(2.94,-0.25) 26(2.94,0.25) 27(2.94,0.75) 28(2.94,1.25) 29(2.94,1.75) 30(2.94,2.25)
  rrect25% 0.26x0.89 smd: 11(-2.25,-2.94) 12(-1.75,-2.94) 13(-1.25,-2.94) 14(-0.75,-2.94) 15(-0.25,-2.94) 16(0.25,-2.94) 17(0.75,-2.94) 18(1.25,-2.94) 19(1.75,-2.94) 20(2.25,-2.94) 31(2.25,2.94) 32(1.75,2.94) 33(1.25,2.94) 34(0.75,2.94) 35(0.25,2.94) 36(-0.25,2.94) 37(-0.75,2.94) 38(-1.25,2.94) 39(-1.75,2.94) 40(-2.25,2.94)
  round 0.025 smd: 41(0,0)
  SIG_0 region: -2.159,-2.159 -2.159,1.651 -1.651,2.159 2.159,2.159 2.159,-2.159
  silkscreen extent -4.13,-3 3,3, body extent -3,-3 3,3, height 1
R0402 [mm]
  rrect10% 0.45x0.6 smd: 1(-0.523,0) 2(0.523,0)
  silkscreen extent -0.97,-0.51 0.97,0.51, body extent -0.5,-0.25 0.5,0.25, height 0.4
R0603 [mm]
  rect 0.75x0.9 smd: 1(-0.889,0) 2(0.889,0)
  silkscreen extent -1.47,-0.64 1.47,0.64, body extent -0.78,-0.43 0.78,0.43, height 0.45
R1206 [mm]
  rect 1.1x1.6 smd: 1(-1.549,0) 2(1.549,0)
  silkscreen extent -0.76,-0.84 0.76,0.84, body extent -1.6,-0.8 1.6,0.8, height 0.55
SOD-523 [mm]
  rect 0.48x0.4 smd: 1(-0.66,0) 2(0.66,0)
  silkscreen extent -0.6,-0.4 0.6,0.4, body extent -0.8,-0.4 0.8,0.4, height 0.7
SOT8 [mm]
  rect 0.3x0.67 smd mask+0.06: 1(-0.75,-0.74) 2(-0.25,-0.74) 3(0.25,-0.74) 4(0.75,-0.74) 5(0.75,0.74) 6(0.25,0.74) 7(-0.25,0.74) 8(-0.75,0.74)
  silkscreen extent -1.57,-0.86 1.1,0.65, body extent -1.05,-0.8 1.05,0.8, height 0.6
SOT23-5 [mm]
  rrect20% 1.21x0.59 smd: 1(-1.255,0.95) 2(-1.255,0) 3(-1.255,-0.95) 4(1.255,-0.95) 5(1.255,0.95)
  silkscreen extent -2.51,-1.45 0.8,1.45, body extent -1.4,-1.45 1.4,1.45, height 1.45
SOT-23 [mm]
  rect 0.65x0.9 smd: 1(-0.965,-1.095) 2(0.965,-1.095) 3(0,1.016)
  silkscreen extent -1.63,-0.74 1.63,0.76, body extent -1.5,-1.25 1.5,1.25, height 1.1
SOT-363 [mm]
  rrect50% 1.02x0.36 smd: 1(-0.955,0.65) 2(-0.955,0) 3(-0.955,-0.65) 4(0.955,-0.65) 5(0.955,0) 6(0.955,0.65)
  silkscreen extent -1.24,-1.02 0.63,1.35, body extent -1.05,-1 1.05,1, height 1.1
SW_B3U-1000PM [mm]
  rect 0.8x1.7 smd paste+0 mask+0.102: 1(-1.7,0) 1(-1.7,0) 2(1.7,0)
  silkscreen extent -1.5,-1.25 1.5,1.25, body extent -2,-1.25 2,1.25, height 1.75
TP [mm]
  round 0.7 smd: 1(0,0)
USB-A-VERTICAL [mm]
  rect 1.428x1.428 / inner round 1.428 / far side rect 1.428x1.428 hole 0.92: 1(0,0)
  round 1.428 hole 0.92: 2(0,2) 3(0,4) 4(0,6)
  round 2.25 hole 1.5: S1(2.72,6.27) S2(2.72,-0.73) S3(-2.72,-0.73) S4(-2.72,6.27)
  silkscreen extent -3.5,-12.33 3.5,6.97, body extent -3.6,-12.44 3.6,6.86, height 14.45
USON-10 [mm]
  rect 0.565x0.2 smd mask+0: 1(-0.417,1) 2(-0.417,0.5) 4(-0.417,-0.5) 5(-0.417,-1) 6(0.417,-1) 7(0.417,-0.5) 9(0.417,0.5) 10(0.417,1)
  rect 0.565x0.4 smd paste-1 mask+0: 3(-0.417,0) 8(0.417,0)
  silkscreen extent -0.92,-1.29 0.5,1.6, body extent -0.5,-1.25 0.5,1.25, height 0.55
WS2812-5050 [mm]
  rrect15% 1.5x1.5 smd: 1(-2.45,1.75) 2(-2.45,-1.75) 3(2.45,-1.75) 4(2.45,1.75)
  silkscreen extent -2.5,-2.5 3.85,2.5, body extent -2.68,-2.47 2.68,2.47, height 1.75
"XTAL 4P 3225" [mm]
  rect 1.15x1.4 smd: 1(-0.8,1.1) 2(-0.8,-1.1) 3(0.8,-1.1) 4(0.8,1.1)
  silkscreen extent -1.25,-0.08 1.25,0.08, body extent -1.25,-1.6 1.25,1.6, height 0.6

## Part data
C1 C2 C3 C4 C5 C6 C7 C8 C9 C10 C11 C12 C13 C14 C15 C16 C17 C18 C19 C20 C21 C22 C25 C26 C27 C28 C29 C30 C31 C32 C33 C34 C35 C36 C37 C38 C39 C40 C41 C42 C43 C44 C45 C46 C47 C48: library part Capacitor_Ceramic
C23: library part Capacitor_Tantalum, Package=Package, Check_prices=https://www.snapeda.com/parts/TAJA106K016RNJ/Kyocera/view-part/?ref=eda, MF="KYOCERA AVX", MP=TAJA106K016RNJ, SnapEDA_Link=https://www.snapeda.com/parts/TAJA106K016RNJ/Kyocera/view-part/?ref=snap
C24: library part Capacitor_Ceramic, "C60474"
D1 D2: library part "Diode ESD array", "4-channel ESD protection diode for USB Type-C and HDMI 2.0 10-USON -40 to 125", Package="USON-10 Texas Instruments", Check_prices=https://www.snapeda.com/parts/TPD4E02B04DQAR/Texas%20Instruments/view-part/576424/?ref=eda, Digi-Key_Part_Number=296-43875-1-ND, MF="Texas Instruments", MP=TPD4E02B04DQAR, Purchase-URL=https://pricing.snapeda.com/search/part/TPD4E02B04DQAR/?ref=eda, SnapEDA_Link=https://www.snapeda.com/parts/TPD4E02B04DQAR/Texas%20Instruments/view-part/576424/?ref=snap
D3 D4 D5 D6 D7 D8 D9 D10 D11: library part Diode_ESD
FB1: library part Ferrite-bead, "BLM18PG330SN1D"
FB2 FB3: library part Ferrite-bead
IC1: "1.6-V to 5.5-V, 40-mâ„", Package=None, Check_prices=https://www.snapeda.com/parts/LM66200DRLR/Texas+Instruments/view-part/?ref=eda, MF="Texas Instruments", MP=LM66200DRLR, SnapEDA_Link=https://www.snapeda.com/parts/LM66200DRLR/Texas+Instruments/view-part/?ref=snap
J1 J2: "USB-C (USB TYPE-C) USB 2.0 Receptacle Connector 24 (16+8 Dummy) Position Surface Mount, Right Angle; Through Hole", Package=None, Availability=Unavailable, MP=DX07S016JA1R1500, Price=None
J3: "USB-A (USB TYPE-A) - Receptacle Connector 4 Position Through Hole, Right Angle", Package=None, Availability="In Stock", Check_prices=https://www.snapeda.com/parts/USB-A1SSW6/On+Shore+Technology+Inc./view-part/?ref=eda, MF="On Shore", MP=USB-A1SSW6, Price=None, Purchase-URL=https://pricing.snapeda.com/search/part/USB-A1SSW6/?ref=eda, SnapEDA_Link=https://www.snapeda.com/parts/USB-A1SSW6/On+Shore+Technology+Inc./view-part/?ref=snap
J4: "SINGLE PORT RJ45 CONNECTOR WITH INTEGRATED MAGNETICS AND LED", Manufacturer_Name="Hanrun Electronics", Datasheet Link=http://www.cecb2b.com/batchupload/inventoryother/zfa_ic_inventory/2011121/zfa__204559_a7c3c0b2f5d8a53eec456bb4b34ade89.PDF, Geometry.Height=15mm, Manufacturer_Part_Number=HR911130C
J5: library part CONNECTOR-2P
L1: library part Inductor
LED1: "5050 symphony LED SMD", Package=Package, Check_prices=https://www.snapeda.com/parts/XL-5050RGBC-WS2812B/Xinglight/view-part/?ref=eda, MF=Xinglight, MP=XL-5050RGBC-WS2812B, SnapEDA_Link=https://www.snapeda.com/parts/XL-5050RGBC-WS2812B/Xinglight/view-part/?ref=snap
MK1: "4.0 mm, Omnidirectional, Surface Mount, 2.0 Vdc, Electret Condenser Microphone", Package="CUI Inc.", Check_prices=https://www.snapeda.com/parts/CMEJ-0413-42-SMT-TR/Same+Sky/view-part/?ref=eda, MF="Same Sky", MP=CMEJ-0413-42-SMT-TR, SnapEDA_Link=https://www.snapeda.com/parts/CMEJ-0413-42-SMT-TR/Same+Sky/view-part/?ref=snap
Q1: library part 2N7000
R1 R2 R3 R4 R5 R6 R7 R8 R9 R10 R11 R12 R13 R14 R15 R16 R17 R18 R19 R20 R21 R22 R23 R24 R25 R26 R27 R28 R29 R30 R31 R32 R33 R34 R35 R36 R37 R38 R39 R39 R40 R40 R41 R42 R43 R44 R46 R47 R48 R49: library part Resistor
U1: "2.5V-5.5V input, 2-A high efficiency step-down buck converter in SOT23 and SOT563 package", Package="SOT-23-THN-6 Texas Instruments", Check_prices=https://www.snapeda.com/parts/TLV62569PDDCR/Texas+Instruments/view-part/?ref=eda, MF="Texas Instruments", MP=TLV62569PDDCR, SnapEDA_Link=https://www.snapeda.com/parts/TLV62569PDDCR/Texas+Instruments/view-part/?ref=snap
U2: "USB TO UART BRIDGE, -40 TO 85DEG C; Bridge Type:USB to UART; Supply Voltage Min:3V; Supply Voltage Max:3.6V; Interface Case Style:QFN; No. of Pins:28Pins; Operating Temperature Min:-40Â°C; Operating Temperature Max:85Â°C; Product Range:-; Automotive Quali", Package=None, Check_prices=https://www.snapeda.com/parts/CP2102NA02GQFN28/Silicon+Labs/view-part/?ref=eda, MF="Silicon Labs", MP=CP2102NA02GQFN28, SnapEDA_Link=https://www.snapeda.com/parts/CP2102NA02GQFN28/Silicon+Labs/view-part/?ref=snap
U3: "Bipolar (BJT) Transistor Array 2 NPN (Dual) 45V 100mA 100MHz 380mW Surface Mount SC-88/SC70-6/SOT-363", Package="SC-88-6 ON Semiconductor", Check_prices=https://www.snapeda.com/parts/BC847BDW1T1G/Onsemi/view-part/?ref=eda, MF=onsemi, MP=BC847BDW1T1G, SnapEDA_Link=https://www.snapeda.com/parts/BC847BDW1T1G/Onsemi/view-part/?ref=snap
U4: "0.5A loading, 4.5-5.5V, 97mÎ© USB power switch, active-high, output discharge, reverse blocking", Package="SOT-23-5 Texas Instruments", Check_prices=https://www.snapeda.com/parts/TPS2051CDBVR/Texas+Instruments/view-part/?ref=eda, MF="Texas Instruments", MP=TPS2051CDBVR, SnapEDA_Link=https://www.snapeda.com/parts/TPS2051CDBVR/Texas+Instruments/view-part/?ref=snap
U6: "INTEGRATED 10/100/1000 GIGABIT ETHERNET TRANSCEIVER", Package="VQFN-40 Texas Instruments", Check_prices=https://www.snapeda.com/parts/TLK1221RHATG4/Texas+Instruments/view-part/?ref=eda, MF="Texas Instruments", MP=TLK1221RHATG4, SnapEDA_Link=https://www.snapeda.com/parts/TLK1221RHATG4/Texas+Instruments/view-part/?ref=snap
U7: "Low Power Mono Audio CODEC. 24-bit, 8 to 96 kHz sampling frequency, 95 dB signal to noise ratio.", Package=None, Check_prices=https://www.snapeda.com/parts/ES8374/Everest+Semiconductor/view-part/?ref=eda, MF="Everest Semiconductor", MP=ES8374, SnapEDA_Link=https://www.snapeda.com/parts/ES8374/Everest+Semiconductor/view-part/?ref=snap
U8: Package=None, Check_prices=https://www.snapeda.com/parts/ME6211C33M5G/Microne/view-part/?ref=eda, MF=Microne, MP=ME6211C33M5G, SnapEDA_Link=https://www.snapeda.com/parts/ME6211C33M5G/Microne/view-part/?ref=snap
Y1: library part "Crystal 4 Pin", "25 MHz ±10ppm Crystal 18pF 40 Ohms 4-SMD, No Lead", Package="SMD-4 EPSON", Availability="In Stock", Check_prices=https://www.snapeda.com/parts/TSX-3225%2025.0000MF10P-C0/EPSON/view-part/?ref=eda, MF=EPSON, MP="TSX-3225 25.0000MF10P-C0", Price=None, Purchase-URL="https://pricing.snapeda.com/search/part/TSX-3225 25.0000MF10P-C0/?ref=eda", SnapEDA_Link=https://www.snapeda.com/parts/TSX-3225%2025.0000MF10P-C0/EPSON/view-part/?ref=snap

## Free pads (board coordinates)
  round 5 hole 3.05 paste-2539.97: ""(3,3) ""(3,52) ""(62,3) ""(62,52)

## Via types
v1: diameter 0.5, hole 0.3, SIG_0 to SIG2, tented both sides, 152 vias
v2: diameter 0.65, hole 0.35, SIG_0 to SIG2, tented both sides, 146 vias
v3: diameter 0.65, hole 0.3, SIG_0 to SIG2, tented both sides, 9 vias
v4: diameter 0.8, hole 0.45, SIG_0 to SIG2, tented both sides, 2 vias

## Nets (pads, with @x,y where several pads share a name; then routed paths per layer and width w, separated by ;. In a path a pad name is that pad's centre, name@x,y a point inside that pad or via, vN(x,y) a via of type N, cw(c..) or ccw(c..) an arc to the next point about the centre after c; other vN are vias at no path point)
32K_IN: R22.2 U5.8 | length 2.2
  SIG_0 w0.2: R22.2@7.493,22.875 7.493,23.495 8.167,24.169 8.167,24.737 U5.8@8.183,24.752
32K_OUT: R23.2 U5.9 | length 1.9
  SIG_0 w0.2: R23.2@8.89,22.875 8.908,22.875 9.033,23 U5.9@9.033,24.752
ADC_DAC_3V3: C17.1 C43.1 U7.16 U8.5 | length 21.9
  SIG_0 w0.254: v2(16.002,10.287) 16.019,10.27 C43.1@16.019,9.398 16.51,9.398 16.891,9.017 16.891,8.515 17.04,8.366 U7.16@17.96,8.366
  SIG_0 w0.3: v1(22.669,1.841) 22.97,2.142 C17.1@23.749,2.142 27.034,2.142 27.239,2.347 U8.5@27.239,3.317
  PWR w0.6: v2(16.002,10.287) 16.002,8.255 19.289,4.968 19.289,2.936 20.383,1.841 v1(22.669,1.841)
CFG_EXT: R39.2@29.845,28.306 U6.32 | length 8.3
  SIG_0 w0.2: v2(29.845,27.559) R39.2@29.845,28.306 ; v1(31.75,33.02) 32.159,33.429 U6.32@32.159,34.144
  SIG_1 w0.165: v2(29.845,27.559) 31.496,29.21 31.496,32.756 31.75,33.01 v1(31.75,33.02)
CHASSIS: C35.2 J4.10 J4.15 J4.16 R36.1 | length 29.5
  SIG_0 w0.6: R36.1@43.713,42.647 43.777,42.71 43.777,44.615 C35.2@43.84,44.679 50.81,44.679 ; J4.10@50.827,43.249 50.81,43.266 50.81,44.679 ; J4.16@54.127,29.789 J4.15@54.127,45.279 53.586,45.279 52.985,44.679 50.81,44.679
DTR: R7.1 U2.28 U3.1 | length 19
  SIG_0 w0.2: v2(26.289,14.732) 26.401,14.732 26.631,14.502 U2.28@27.612,14.502 ; v2(29.464,22.352) 29.972,21.844 R7.1@29.972,21.351 32.527,21.351 32.654,21.478 U3.1@32.654,22.291
  SIG2 w0.2: v2(26.289,14.732) 24.003,17.018 24.003,19.685 25.337,21.019 28.683,21.019 29.464,21.8 v2(29.464,22.352)
ESP_3V3: C45.2 C46.2 J6.2 Q1.1 R46.1 R48.1 U5.3 U5.4 | length 31.5
  SIG_0 w0.2: C46.2@3.302,22.877 3.402,22.877 3.527,22.752 3.527,22.652 4.256,21.923 4.605,21.923 R46.1@4.699,21.829 ; J6.2@12.827,21.082 11.303,21.082 10.627,20.406 10.627,18.747 11.228,18.146 12.431,18.146 12.7,18.415 13.724,18.415 15.198,16.942 15.198,16.555 Q1.1@15.319,16.434
  SIG_0 w0.4: v2@1.778,23.368 C45.2@1.778,22.682 1.973,22.877 C46.2@3.302,22.877 ; C46.2@3.402,22.877 3.427,22.902 3.427,23.002 3.933,23.508 ; U5.3@3.933,24.752 3.933,23.508 ; U5.4@4.783,24.752 4.783,23.833 4.458,23.508 3.933,23.508
  PWR w0.6: v2(1.778,23.622) 3.175,23.622 6.858,19.939 11.684,19.939 J6.2@12.827,21.082
ETH_3V3: C25.2 C26.2 C27.2 C28.2 C29.2 C30.2 C31.2 FB1.2 R39.1@29.845,29.352 R40.1@28.575,29.352 U6.11 U6.28 U6.29 U6.40 | length 20.5
  SIG_0 w0.2: FB1.2@26.943,28.486 26.993,28.486 27.293,28.786 27.293,28.836 27.809,29.352 R39.1@29.845,29.352 ; U6.40@36.159,34.144 36.159,33.939 36.189,33.909 36.957,33.909
  SIG_0 w0.254: C28.2@28.465,35.138 C28.2@28.465,35.306 28.465,35.206 28.621,35.05 28.679,35.05 28.679,34.992 ; C28.2@28.534,35.138 29.23,35.834 U6.28@30.969,35.834 ; 28.73,35.334 U6.29@30.969,35.334 ; U6.11@36.159,40.024 37.103,40.024 37.465,40.386 C29.2@37.465,41.639
  SIG_0 w0.3: 36.957,33.909 37.719,33.909 39.243,32.385 C30.2@39.243,31.767
  SIG_0 w0.4: v2@25.908,28.956 25.908,30.988 26.674,31.754 26.674,31.804 26.874,32.004 C25.2@26.924,32.004 ; 26.211,28.653 26.776,28.653 FB1.2@26.943,28.486
  PWR w0.4: v2(25.908,28.829) v2@25.908,28.956
  other v2: 38.758,32.87 37.719,41.148
GND: BT1.1 BT2.1 C1.1 C2.1 C3.1 C4.1 C5.2 C6.2 C7.2 C8.2 C9.1 C10.1 C11.1 C12.1 C13.2 C14.2 C15.2 C16.2 C17.2 C18.2 C19.1 C20.1 C21.1 C22.1 C23.2 C24.2 C25.1 C26.1 C27.1 C28.1 C29.1 C30.1 C31.1 C32.1 C33.1 C34.1 C35.1 C36.2 C37.2 C41.2 C42.2 C43.2 C44.1 C45.1 C46.1 C47.1 C48.2 CONN1.1 CONN1.2 CONN1.8 CONN1.33 CONN1.34 CONN1.37 CONN1.38 D1.3 D1.8 D2.3 D2.8 D3.2 D4.2 D5.2 D6.2 D7.2 D8.2 D9.2 D10.2 D11.2 IC1.1 IC1.4 IC1.5 J1.1 J1.12 J1.S1 J1.S2 J1.S3 J1.S4 J1.S5 J1.S6 J2.1 J2.12 J2.S1 J2.S2 J2.S3 J2.S4 J2.S5 J2.S6 J3.4 J3.S1 J3.S2 J3.S3 J3.S4 J4.12 J4.13 J5. LD1.2 LED1.3 pad. R4.1 R8.2 R9.2 R17.2 R18.2 R33.1 R36.2 R37.2 R38.2 R39.1@62.789,13.266 R42.1 R44.2 R47.1 U1.2 U2.3 U2.29 U4.2 U5.1 U5.2 U5.26 U5.47 U5.48 U5.72 U5.73 U5.74 U5.75 U5.76 U5.77 U5.78 U5.79 U5.80 U5.81 U5.82 U5.83 U5.84 U5.85 U5.86 U5.87 U5.88 U5.89 U5.90 U5.92 U5.93 U5.94 U5.95 U5.96 U5.97 U5.98 U5.99 U6.41 U7.3 U7.12 U7.17 U7.29 U8.2 Y1.2 Y1.4 | length 62.6
  SIG_0 w0.2: J4.13@62.077,41.428 J4.13@62.077,41.619
  SIG_0 w0.254: 0.889,23.749 1.133,23.993 U5.99@1.133,24.752 ; U5.95@10.763,33.39 U5.95@12.425,35.052 ; U5.95@10.763,36.714 U5.95@12.425,35.052 ; U5.95@14.086,33.39 U5.95@12.425,35.052 ; U5.95@14.086,36.714 U5.95@12.425,35.052 ; v2(15.875,12.065) 16.146,12.336 C15.2@18.161,12.336 18.193,12.304 18.684,12.304 19.82,11.168 U7.12@19.82,9.726 19.812,9.718 19.812,7.874 U7.29@19.82,7.866 ; U7.17@17.96,7.866 U7.29@19.82,7.866 ; v2(18.974,14.427) C16.2@21.463,14.427 ; U7.3@22.68,6.866 20.82,6.866 v3(20.32,7.366) U7.29@19.82,7.866 ; 29.083,12.573 29.472,12.962 U2.3@29.472,13.642 29.472,15.502 U2.29@29.972,16.002 ; C20.1@39.768,35.834 40.772,35.834 cw(c40.772,35.789) v4(40.818,35.789) ccw(c41.027,35.789) 41.027,35.579 D1.8@43.009,35.579 D1.3@43.844,35.579 v1(44.685,35.579) ; C1.1@39.768,38.334 40.798,38.334 ccw(c40.798,38.532) v4(40.996,38.532) cw(c41.218,38.532) 41.218,38.754 D2.8@43.009,38.754 D2.3@43.844,38.754 v1(44.685,38.754)
  SIG_0 w0.4: 30.861,7.874 31.38,7.355 31.38,6.8 J1.1@31.44,6.74 ; D5.2@32.614,8.636 32.654,8.636 32.654,9.032 v2(33.02,9.398) ; J1.12@37.64,6.74 37.7,6.8 37.7,7.347 38.1,7.747 ; J2.12@53.64,6.74 53.7,6.8 53.7,7.218 54.483,8.001
  SIG2 w0.4: v2(59.944,25.262) 59.944,31.316 J4.12@62.077,33.449 J4.13@62.077,41.619
  other v1: 6.35,2.54 13.97,2.54 29.21,2.54 31.75,2.54 34.29,2.54 57.15,2.54 7.62,5.08 22.86,5.08 55.88,5.08 58.42,5.08 6.35,7.62 8.89,7.62 29.21,7.62 57.15,7.62 59.69,7.62 62.23,7.62 2.54,10.16 5.08,10.16 12.7,10.16 1.27,12.7 3.81,12.7 49.53,12.7 52.07,12.7 36.83,17.78 35.56,20.32 58.42,20.32 60.96,20.32 63.5,20.32 44.45,22.86 49.53,22.86 57.15,22.86 59.69,22.86 62.23,22.86 30.48,25.4 40.64,25.4 43.18,25.4 45.72,25.4 48.26,25.4 50.8,25.4 53.34,25.4 55.88,25.4 58.42,25.4 60.96,25.4 63.5,25.4 2.032,26.127 2.032,26.977 2.032,27.827 16.51,27.94 29.21,27.94 36.83,27.94 30.607,29.337 2.032,29.527 2.032,30.377 2.032,31.227 2.032,32.077 32.131,32.131 2.032,32.927 2.032,33.777 2.032,34.627 2.032,35.477 32.512,35.687 33.909,35.687 35.306,35.687 2.032,36.327 32.512,37.084 33.909,37.084 35.306,37.084 2.032,37.177 2.032,38.027 32.512,38.481 33.909,38.481 35.306,38.481 2.032,38.877 2.032,39.727 2.032,40.577 40.64,40.64 43.18,40.64 2.032,41.427 2.032,42.277 38.354,42.672 2.032,43.127 3.81,43.18 37.465,43.434 2.032,43.977 1.133,46.251 2.233,46.251 1.27,48.26 3.81,48.26 57.15,48.26 59.69,48.26 62.23,48.26 58.42,50.8
  other v2: 3.003,0.996 62.003,0.996 1.585,1.581 4.419,1.585 60.585,1.581 63.419,1.585 0.996,2.997 5.004,3.003 59.996,2.997 64.004,3.003 1.581,4.415 4.415,4.419 60.581,4.415 63.415,4.419 2.997,5.004 61.997,5.004 14.351,6.858 24.638,7.239 14.351,8.128 13.716,9.398 49.022,12.192 48.006,12.954 33.147,13.208 51.308,13.462 52.578,13.462 53.848,13.462 55.118,13.462 51.308,14.478 52.578,14.478 53.848,14.478 55.118,14.478 48.006,14.732 3.003,49.996 62.003,49.996 1.585,50.581 60.585,50.581 4.419,50.585 63.419,50.585 0.996,51.997 5.004,52.003 59.996,51.997 64.004,52.003 1.581,53.415 4.415,53.419 60.581,53.415 63.415,53.419 2.997,54.004 61.997,54.004
  other v3: 19.304,6.35 20.32,6.35 21.336,6.35 19.304,7.366 21.336,7.366 19.304,8.382 20.32,8.382 21.336,8.382
GPIO0: CONN1.9 R22.1 | length 41.3
  SIG_0 w0.2: v2(7.493,21.133) R22.1@7.493,21.829
  SIG2 w0.2: v2(7.493,21.133) 7.493,37.846 8.763,39.116 8.763,41.402 7.493,42.672 7.493,48.514 8.509,49.53 16.832,49.53 CONN1.9@18.53,51.228
GPIO1: CONN1.12 R23.1 | length 42.3
  SIG_0 w0.2: R23.1@8.89,21.829 v2@9.764,21.829
  SIG2 w0.2: v2(9.839,21.833) 8.89,22.782 8.89,36.576 10.414,38.1 10.414,48.153 11.156,48.895 17.145,48.895 17.907,49.657 18.853,49.657 19.812,50.616 19.812,52.51 CONN1.12@21.07,53.768
GPIO2: CONN1.7 U5.6 | length 33.4
  SIG_0 w0.2: U5.6@6.483,24.752 6.483,25.787 7.366,26.67 v2(9.779,26.67) ; v2(11.303,47.752) 10.941,48.114 10.941,48.28 12.444,49.784 14.546,49.784 CONN1.7@15.99,51.228
  SIG2 w0.2: v2(9.779,26.67) 9.779,36.068 11.303,37.592 v2(11.303,47.752)
GPIO3: CONN1.10 U5.7 | length 37.3
  SIG_0 w0.2: U5.7@7.333,24.752 7.433,24.852 7.433,25.721 7.747,26.035 v2(10.795,26.035) ; v2(12.319,47.117) 12.319,48.26 13.335,49.276 16.51,49.276 17.272,50.038 17.272,52.51 CONN1.10@18.53,53.768
  SIG2 w0.2: v2(10.795,26.035) 10.795,35.687 12.319,37.211 v2(12.319,47.117)
GPIO4: CONN1.32 R40.2@28.575,28.306 U5.10 U6.31 | length 79.8
  SIG_0 w0.165: v1(9.882,22.962) 9.886,22.965 9.886,24.749 U5.10@9.883,24.752 ; R40.2@28.575,28.306 28.575,27.051 29.083,26.543 v2(29.588,26.543)
  SIG_0 w0.2: v1(31.115,33.401) 31.115,33.782 31.242,33.909 31.629,33.909 31.659,33.939 U6.31@31.659,34.144
  SIG_1 w0.165: v1(9.882,22.962) 10.541,22.303 10.541,19.329 13.141,16.73 28.184,16.73 31.472,20.017 31.472,25.299 30.229,26.543 v2(29.588,26.543) 28.702,27.429 28.702,29.21 31.115,31.623 v1(31.115,33.401)
  SIG2 w0.2: v1(31.115,33.401) 31.115,38.862 31.623,39.37 37.465,39.37 47.625,49.53 47.625,52.613 CONN1.32@46.47,53.768
GPIO5: U5.11 U6.13 | length 55
  SIG_0 w0.165: v1(10.732,22.962) 10.736,22.965 10.736,24.749 U5.11@10.733,24.752
  SIG_0 w0.2: U6.13@35.159,40.024 35.159,40.874 35.941,41.656 v2(36.322,41.656)
  SIG_1 w0.165: v1(10.732,22.962) 10.732,22.887 10.922,22.697 10.922,19.583 13.327,17.179 26.958,17.179 30.065,20.286 30.065,24.418 28.321,26.162 28.321,29.464 30.48,31.623 30.48,33.528 31.369,34.417 32.258,34.417 33.274,35.433 33.274,38.608 v2@36.195,41.529 ; v2@36.238,41.486 36.322,41.571 v2(36.322,41.656)
GPIO6: R47.2 U5.12 U6.14 | length 54.4
  SIG_0 w0.165: v1(11.582,22.962) 11.586,22.965 11.586,24.749 U5.12@11.583,24.752
  SIG_0 w0.2: U6.14@34.659,40.024 34.659,41.136 v2(36.068,42.545) R47.2@36.068,43.165
  SIG_1 w0.165: v1(11.582,22.962) 11.582,22.403 11.278,22.098 11.278,19.863 13.513,17.628 26.416,17.628 28.575,19.787 28.575,24.384 27.94,25.019 27.94,29.718 29.718,31.496 29.718,34.417 31.369,36.068 31.369,38.1 35.721,42.452 35.975,42.452 v2(36.068,42.545)
GPIO7: U5.13 U6.12 | length 54.9
  SIG_0 w0.165: v1(12.432,22.962) 12.436,22.965 12.436,24.749 U5.13@12.433,24.752
  SIG_0 w0.2: U6.12@35.659,40.024 35.668,40.024 35.668,40.748 35.941,41.021 v2@36.703,41.021
  SIG_1 w0.165: v1(12.432,22.962) 12.432,22.465 11.684,21.717 11.684,20.091 13.665,18.11 26.111,18.11 27.31,19.309 27.31,22.516 27.304,22.522 27.304,22.944 27.31,22.95 27.31,29.774 29.337,31.801 29.337,34.544 30.861,36.068 30.861,38.481 35.687,43.307 36.322,43.307 37.084,42.545 37.084,41.275 v2(36.703,40.894)
  SIG2 w0.165: v2(36.703,40.894) v2@36.83,40.894
GPIO8: R24.1 U5.14 | length 47.8
  SIG_0 w0.165: v1(13.276,25.781) 13.279,25.778 13.279,24.755 U5.14@13.283,24.752 ; R24.1@31.496,44.211 v1(31.496,44.958)
  SIG_1 w0.121: v1(13.276,25.781) 13.276,26.422 11.557,28.141 11.557,28.497 11.557,28.557 11.445,28.67 11.089,28.67 10.977,28.782 10.977,28.932 11.089,29.045 12.14,29.045 12.252,29.157 12.252,29.307 12.14,29.419 11.089,29.419 10.977,29.532 10.977,29.682 11.089,29.794 12.14,29.794 12.252,29.907 12.252,30.057 12.14,30.169 11.089,30.169 10.977,30.281 10.977,30.431 11.089,30.544 12.14,30.544 12.252,30.656 12.252,30.806 12.14,30.919 11.089,30.919 10.977,31.031 10.977,31.181 11.089,31.293 12.14,31.293 12.252,31.406 12.252,31.556 12.14,31.668 11.089,31.668 10.977,31.781 10.977,31.931 11.089,32.043 12.14,32.043 12.252,32.156 12.252,32.305 12.14,32.418 11.111,32.418 10.999,32.53 10.999,32.68 11.111,32.793 11.445,32.793 11.557,32.905 11.557,33.483 11.557,33.655 21.209,43.307 30.734,43.307 31.496,44.069 v1(31.496,44.958)
GPIO9: R21.1 U5.15 | length 47.8
  SIG_0 w0.165: v1(14.126,25.781) 14.129,25.778 14.129,24.755 U5.15@14.133,24.752 ; R21.1@32.639,44.211 v1(32.639,44.958)
  SIG_1 w0.121: v1(14.126,25.781) 14.126,27.022 13.589,27.559 13.589,28.396 13.589,28.457 13.477,28.569 13.447,28.569 13.335,28.682 13.335,28.832 13.447,28.944 14.32,28.944 14.432,29.056 14.432,29.206 14.32,29.319 13.447,29.319 13.335,29.431 13.335,29.581 13.447,29.694 14.32,29.694 14.432,29.806 14.432,29.956 14.32,30.068 13.447,30.068 13.335,30.181 13.335,30.331 13.447,30.443 14.32,30.443 14.432,30.556 14.432,30.706 14.32,30.818 13.447,30.818 13.335,30.93 13.335,31.08 13.447,31.193 14.32,31.193 14.432,31.305 14.432,31.455 14.32,31.568 13.447,31.568 13.335,31.68 13.335,31.83 13.447,31.943 14.32,31.943 14.432,32.055 14.432,32.205 14.32,32.317 13.447,32.317 13.335,32.43 13.335,32.58 13.447,32.692 14.32,32.692 14.432,32.805 14.432,32.955 14.32,33.067 13.447,33.067 13.335,33.179 13.335,33.329 13.447,33.442 14.237,33.442 14.35,33.554 14.35,33.704 14.237,33.817 13.701,33.817 13.589,33.929 13.589,34.163 13.589,34.29 21.717,42.418 31.115,42.418 32.639,43.942 v1(32.639,44.958)
GPIO10: R15.1 U5.16 | length 47.8
  SIG_0 w0.165: v1(14.976,25.781) 14.979,25.778 14.979,24.755 U5.16@14.983,24.752 ; R15.1@33.782,44.211 v1(33.782,44.958)
  SIG_1 w0.121: v1(14.976,25.781) 14.976,27.422 16.129,28.575 16.129,29.022 16.129,29.082 16.017,29.195 15.544,29.195 15.432,29.307 15.432,29.457 15.544,29.57 16.452,29.57 16.565,29.682 16.565,29.832 16.452,29.945 15.544,29.945 15.432,30.057 15.432,30.207 15.544,30.319 16.452,30.319 16.565,30.432 16.565,30.582 16.452,30.694 15.544,30.694 15.432,30.807 15.432,30.957 15.544,31.069 16.452,31.069 16.565,31.181 16.565,31.331 16.452,31.444 15.544,31.444 15.432,31.556 15.432,31.706 15.544,31.819 16.452,31.819 16.565,31.931 16.565,32.081 16.452,32.193 15.544,32.193 15.432,32.306 15.432,32.456 15.544,32.568 16.452,32.568 16.565,32.681 16.565,32.831 16.452,32.943 15.544,32.943 15.432,33.056 15.432,33.205 15.544,33.318 16.452,33.318 16.565,33.43 16.565,33.58 16.452,33.693 15.544,33.693 15.432,33.805 15.432,33.955 15.544,34.068 16.282,34.068 16.394,34.18 16.394,34.33 16.282,34.442 16.241,34.442 16.129,34.555 16.129,35.328 16.129,35.433 22.225,41.529 31.623,41.529 33.782,43.688 v1(33.782,44.958)
GPIO11: R14.1 U5.17 | length 47.8
  SIG_0 w0.165: v1(15.826,25.781) 15.829,25.778 15.829,24.755 U5.17@15.833,24.752 ; R14.1@34.925,44.211 v1(34.925,44.958)
  SIG_1 w0.121: v1(15.826,25.781) 15.826,26.494 18.034,28.702 18.034,29.424 18.034,29.485 17.922,29.597 17.659,29.597 17.547,29.71 17.547,29.86 17.659,29.972 18.488,29.972 18.601,30.084 18.601,30.234 18.488,30.347 17.659,30.347 17.547,30.459 17.547,30.609 17.659,30.722 18.488,30.722 18.601,30.834 18.601,30.984 18.488,31.097 17.659,31.097 17.547,31.209 17.547,31.359 17.659,31.471 18.488,31.471 18.601,31.584 18.601,31.734 18.488,31.846 17.659,31.846 17.547,31.959 17.547,32.109 17.659,32.221 18.488,32.221 18.601,32.333 18.601,32.483 18.488,32.596 17.659,32.596 17.547,32.708 17.547,32.858 17.659,32.971 18.488,32.971 18.601,33.083 18.601,33.233 18.488,33.345 17.659,33.345 17.547,33.458 17.547,33.608 17.659,33.72 18.488,33.72 18.601,33.833 18.601,33.983 18.488,34.095 17.659,34.095 17.547,34.207 17.547,34.357 17.659,34.47 18.488,34.47 18.601,34.582 18.601,34.732 18.488,34.845 17.755,34.845 17.642,34.957 17.642,35.107 17.755,35.219 17.922,35.219 18.034,35.332 18.034,35.94 18.034,36.068 22.606,40.64 32.004,40.64 34.925,43.561 v1(34.925,44.958)
GPIO12: R25.1 U5.18 | length 47.8
  SIG_0 w0.165: v1(16.676,25.781) 16.679,25.778 16.679,24.755 U5.18@16.683,24.752 ; R25.1@30.353,44.211 v1(30.353,44.958)
  SIG_1 w0.121: v1(16.676,25.781) 16.676,25.058 16.129,24.511 9.398,24.511 8.636,25.273 8.636,27.178 9.525,28.067 9.525,28.282 9.525,28.342 9.413,28.455 9.383,28.455 9.271,28.567 9.271,28.717 9.383,28.83 9.992,28.83 10.104,28.942 10.104,29.092 9.992,29.204 9.383,29.204 9.271,29.317 9.271,29.467 9.383,29.579 9.908,29.579 10.02,29.692 10.02,29.842 9.908,29.954 9.413,29.954 9.3,30.067 9.3,30.216 9.413,30.329 9.525,30.441 9.525,32.893 9.525,33.02 20.574,44.069 29.464,44.069 v1(30.353,44.958)
GPIO13: R26.1 U5.19 | length 47.8
  SIG_0 w0.165: v1(17.526,25.781) 17.529,25.778 17.529,24.755 U5.19@17.533,24.752 ; R26.1@29.21,44.211 v1(29.21,44.958)
  SIG_1 w0.121: v1(17.526,25.781) 17.526,24.706 16.481,23.661 9.046,23.661 7.747,24.96 7.747,32.512 20.154,44.919 v1@29.21,44.919
GPIO14: R32.1 U5.20 | length 2
  SIG_0 w0.165: R32.1@18.03,22.875 18.03,23.491 18.383,23.844 U5.20@18.383,24.752
GPIO15: R31.1 U5.21 | length 2
  SIG_0 w0.165: R31.1@19.046,22.875 19.046,23.618 19.233,23.805 U5.21@19.233,24.752
GPIO16: R27.1 U5.22 | length 1.9
  SIG_0 w0.165: R27.1@20.062,22.875 20.083,22.896 U5.22@20.083,24.752
GPIO17: R28.1 U5.23 | length 1.9
  SIG_0 w0.165: U5.23@20.933,24.752 20.933,23.644 21.078,23.499 R28.1@21.078,22.875
GPIO18: R29.1 U5.24 | length 2
  SIG_0 w0.165: U5.24@21.783,24.752 21.783,23.81 22.094,23.499 R29.1@22.094,22.875
GPIO19: R30.1 U5.25 | length 2.1
  SIG_0 w0.165: U5.25@22.633,24.752 22.633,24.103 23.11,23.626 R30.1@23.11,22.875
GPIO35: CONN1.25 U5.44 | length 20.1
  SIG_0 w0.2: U5.44@23.733,41.427 24.917,41.427 27.356,43.866 27.356,45.517 28.448,46.609 34.231,46.609 CONN1.25@38.85,51.228
GPIO36: CONN1.24 U5.45 | length 22
  SIG_0 w0.2: U5.45@23.733,42.277 24.827,42.277 26.543,43.993 26.543,45.847 27.94,47.244 34.163,47.244 37.592,50.673 37.592,52.486 CONN1.24@36.31,53.768
GPIO37: CONN1.23 U5.46 | length 17
  SIG_0 w0.2: U5.46@23.733,43.127 24.839,43.127 25.883,44.171 25.883,46.076 27.686,47.879 32.961,47.879 CONN1.23@36.31,51.228
GPIO38: CONN1.22 U5.49 | length 19.7
  SIG_0 w0.2: U5.49@21.783,45.352 21.783,46.294 22.854,47.365 25.845,47.365 26.994,48.514 32.766,48.514 35.179,50.927 35.179,52.359 CONN1.22@33.77,53.768
GPIO39: CONN1.21 U5.50 | length 15.8
  SIG_0 w0.2: U5.50@20.933,45.352 20.933,46.206 22.606,47.879 25.527,47.879 26.67,49.022 31.564,49.022 CONN1.21@33.77,51.228
GPIO40: CONN1.19 U5.51 | length 14
  SIG_0 w0.2: U5.51@20.083,45.352 20.083,46.118 22.352,48.387 25.273,48.387 26.543,49.657 29.659,49.657 CONN1.19@31.23,51.228
GPIO42: CONN1.20 U5.52 | length 17
  SIG_0 w0.2: U5.52@19.233,45.352 19.233,46.03 22.225,49.022 25.019,49.022 26.035,50.038 29.337,50.038 29.972,50.673 29.972,52.51 CONN1.20@31.23,53.768
GPIO43: CONN1.17 U5.53 | length 13.3
  SIG_0 w0.2: U5.53@18.402,45.352 U5.53@18.383,45.352 18.383,46.069 19.177,46.863 v2(19.177,46.99)
  SIG2 w0.2: v2(19.177,46.99) 24.511,46.99 28.69,51.169 CONN1.17@28.69,51.228
GPIO44: CONN1.18 U5.54 | length 16.1
  SIG_0 w0.2: U5.54@17.533,45.352 17.533,46.362 19.05,47.879 20.066,47.879 21.717,49.53 24.003,49.53 24.892,50.419 24.892,51.943 25.4,52.451 27.373,52.451 CONN1.18@28.69,53.768
GPIO45: CONN1.15 U5.55 | length 13.1
  SIG_0 w0.2: U5.55@16.683,45.352 16.683,46.394 16.932,46.643
  SIG2 w0.2: v2(17.018,46.99) 17.104,46.904 17.948,46.904 18.923,47.879 24.003,47.879 26.15,50.026 CONN1.15@26.15,51.228
GPIO46: CONN1.16 U5.56 | length 16
  SIG_0 w0.2: U5.56@15.833,45.352 15.833,46.953 16.002,47.122 v2(16.002,47.244)
  SIG2 w0.2: v2(16.002,47.244) 16.383,47.625 17.78,47.625 18.542,48.387 22.86,48.387 24.892,50.419 24.892,52.51 CONN1.16@26.15,53.768
GPIO47: CONN1.13 U5.57 | length 12.2
  SIG_0 w0.2: U5.57@14.983,45.352 14.983,46.733 v2(14.986,46.736)
  SIG2 w0.2: v2(14.986,46.736) 14.986,47.371 15.875,48.26 17.399,48.26 18.161,49.022 21.404,49.022 CONN1.13@23.61,51.228
GPIO48: CONN1.14 U5.58 | length 15
  SIG_0 w0.2: U5.58@14.133,45.352 14.133,47.28 14.859,48.006 18.161,48.006 18.796,48.641 20.066,48.641 22.352,50.927 22.352,52.51 CONN1.14@23.61,53.768
GPIO49: CONN1.11 U5.59 | length 11.4
  SIG_0 w0.2: U5.59@13.283,45.352 13.283,47.446 14.478,48.641 17.272,48.641 18.161,49.53 19.372,49.53 CONN1.11@21.07,51.228
GPIO50: U5.60 U7.1 | length 60